# Allegro board K3_COM260_KIT_V02-20260310_1330_pcb.brd
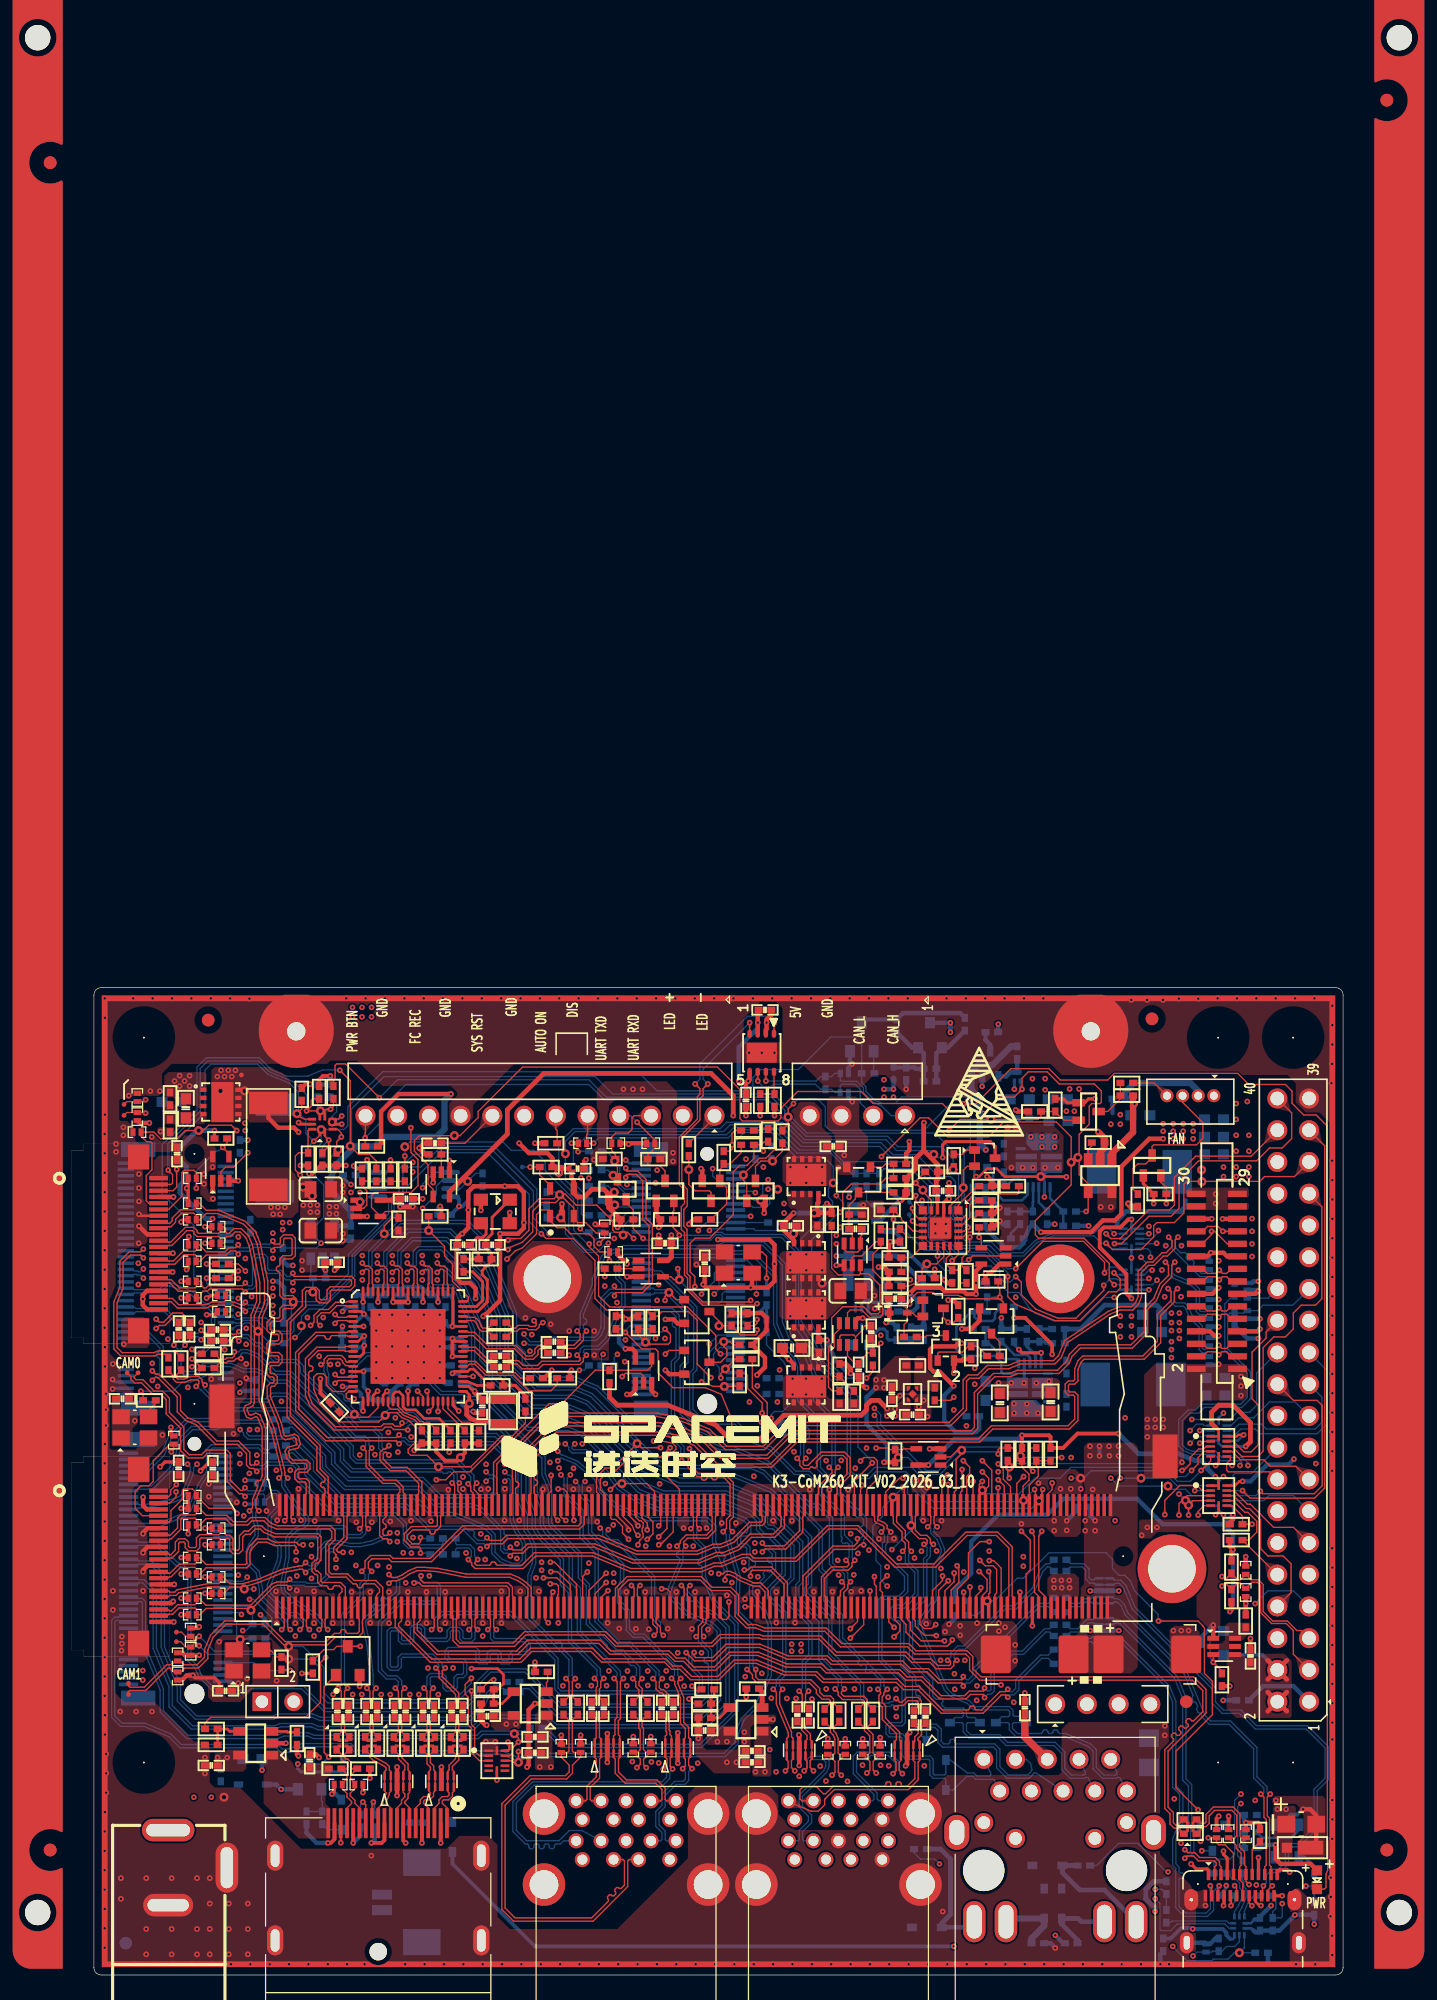
[diagram p0: board, top side]
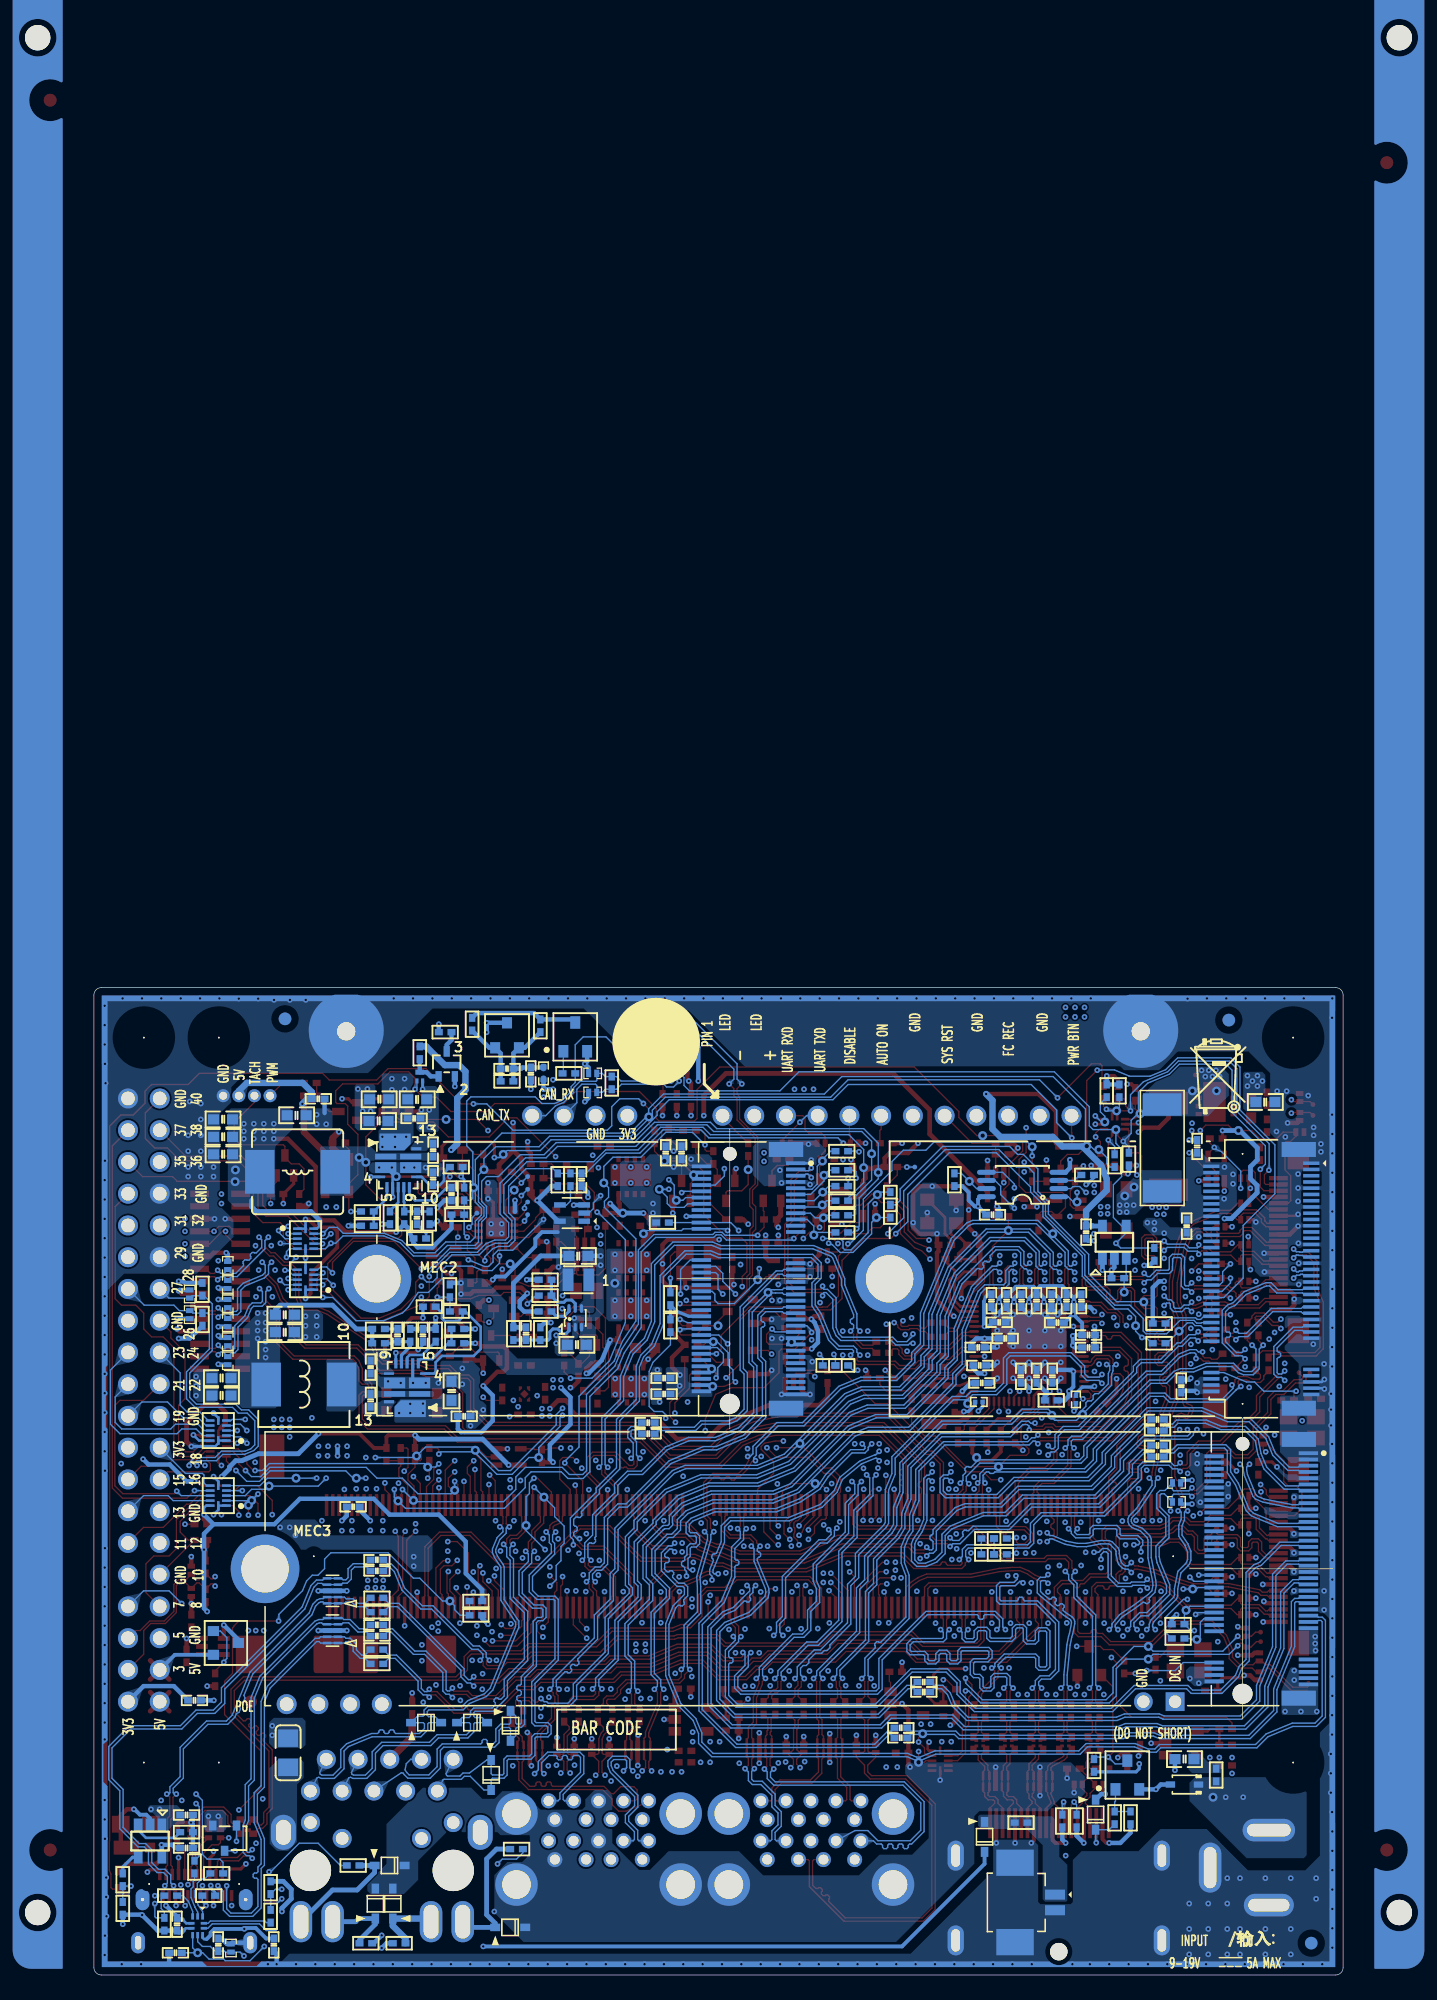
[diagram p1: board, bottom side, seen from below]

Outline 100 x 79 mm; copper layers: TOP, GND02, ART03, ART04, GND05, BOTTOM. Coordinates in mm from the lower left corner of the outline.
Outline path: 0,78.4 0,0.6 arc(0.18,0.18) 0.6,0 99.4,0 arc(99.82,0.18) 100,0.6 100,78.4 arc(99.82,78.82) 99.4,79 0.6,79 arc(0.18,78.82) 0,78.4

## Design rules (mm)
constraint set DEFAULT: min track width 0.1, pair gap 0.125
net group CSI0_D0: nets MIPI_CSI0_DN2 MIPI_CSI0_DP2
net group CSI0_D1: nets MIPI_CSI0_DN3 MIPI_CSI0_DP3
net group CSI1_CLK: nets MIPI_CSI0_CLKN MIPI_CSI0_CLKP
net group CSI1_D0: nets MIPI_CSI0_DN0 MIPI_CSI0_DP0
net group CSI1_D1: nets MIPI_CSI0_DN1 MIPI_CSI0_DP1
net group DP1_AUXP: nets DP1_AUXN DP1_AUXP
net group DP1_TX0N: nets DP1_TX0N DP_CON_LANE0_N
net group DP1_TX0P: nets DP1_TX0P DP_CON_LANE0_P
net group DP1_TX1N: nets DP1_TX1N DP_CON_LANE1_N
net group DP1_TX1P: nets DP1_TX1P DP_CON_LANE1_P
net group DP1_TX2N: nets DP1_TX2N DP_CON_LANE2_N
net group DP1_TX2P: nets DP1_TX2P DP_CON_LANE2_P
net group DP1_TX3N: nets DP1_TX3N DP_CON_LANE3_N
net group DP1_TX3P: nets DP1_TX3P DP_CON_LANE3_P
net group DP_GBE_MDI0: nets PHY1_MDI0+ PHY1_MDI0-
net group DP_GBE_MDI1: nets PHY1_MDI1+ PHY1_MDI1-
net group DP_GBE_MDI2: nets PHY1_MDI2+ PHY1_MDI2-
net group DP_GBE_MDI3: nets PHY1_MDI3+ PHY1_MDI3-
net group DSP1_DN: nets DSP1_DN U3_D1N
net group DSP1_DP: nets DSP1_DP U3_D1P
net group DSP1_SSRX: nets U3_RX1N U3_RX1P
net group DSP1_SSTX_N: nets DSP1_SSTX_N U3_TX1N
net group DSP1_SSTX_P: nets DSP1_SSTX_P U3_TX1P
net group DSP2_DN: nets DSP2_DN U3_D2N
net group DSP2_DP: nets DSP2_DP U3_D2P
net group DSP2_SSRX: nets U3_RX2N U3_RX2P
net group DSP2_SSTX_N: nets DSP2_SSTX_N U3_TX2N
net group DSP2_SSTX_P: nets DSP2_SSTX_P U3_TX2P
net group DSP3_DN: nets DSP3_DN U3_D3N
net group DSP3_DP: nets DSP3_DP U3_D3P
net group DSP3_SSRX: nets U3_RX3N U3_RX3P
net group DSP3_SSTX_N: nets DSP3_SSTX_N U3_TX3N
net group DSP3_SSTX_P: nets DSP3_SSTX_P U3_TX3P
net group DSP4_DN: nets DSP4_DN U3_D4N
net group DSP4_DP: nets DSP4_DP U3_D4P
net group DSP4_SSRX: nets U3_RX4N U3_RX4P
net group DSP4_SSTX_N: nets DSP4_SSTX_N U3_TX4N
net group DSP4_SSTX_P: nets DSP4_SSTX_P U3_TX4P
net group MIPI_CSI1_CLK: nets MIPI_CSI1_CLKN MIPI_CSI1_CLKP
net group MIPI_CSI2_CLKP: nets MIPI_CSI2_CLKN MIPI_CSI2_CLKP
net group MIPI_CSI2_DP0: nets MIPI_CSI2_DN0 MIPI_CSI2_DP0
net group MIPI_CSI2_DP1: nets MIPI_CSI2_DN1 MIPI_CSI2_DP1
net group MIPI_CSI2_DP2: nets MIPI_CSI2_DN2 MIPI_CSI2_DP2
net group MIPI_CSI2_DP3: nets MIPI_CSI2_DN3 MIPI_CSI2_DP3
net group MIPI_CSI3_CLK: nets MIPI_CSI3_CLKN MIPI_CSI3_CLKP
net group PCIE0_REFCLK_P: nets PCIE0_REFCLK_N PCIE0_REFCLK_P
net group PCIE0_RX0: nets PCIE0_RX0N PCIE0_RX0P
net group PCIE0_RX1: nets PCIE0_RX1N PCIE0_RX1P
net group PCIE0_RX2: nets PCIE1_RX0N PCIE1_RX0P
net group PCIE0_RX3: nets PCIE1_RX1N PCIE1_RX1P
net group PCIE0_TX0N: nets PCIE0_TX0N PCIEA_0_TX0_M2_N
net group PCIE0_TX0P: nets PCIE0_TX0P PCIEA_0_TX0_M2_P
net group PCIE0_TX1N: nets PCIE0_TX1N PCIEA_1_TX1_M2_N
net group PCIE0_TX1P: nets PCIE0_TX1P PCIEA_1_TX1_M2_P
net group PCIE1_CLK: nets PCIE5_REFCLK_N PCIE5_REFCLK_P
net group PCIE1_RX0: nets PCIE5_RX0N PCIE5_RX0P
net group PCIE1_TX0: nets PCIE5_TX0N PCIE5_TX0P
net group PCIE1_TX0N: nets PCIE1_TX0N PCIEB_0_TX0_M2_N
net group PCIE1_TX0P: nets PCIE1_TX0P PCIEB_0_TX0_M2_P
net group PCIE1_TX1N: nets PCIE1_TX1N PCIEB_1_TX1_M2_N
net group PCIE1_TX1P: nets PCIE1_TX1P PCIEB_1_TX1P_M2_P
net group PCIE2/USB3-B_TX0: nets PCIE2/USB3-B_TX0N PCIE2/USB3-B_TX0P
net group PCIE3/USB3-C_RX0N: nets PCIE3/USB3-C_RX0N PCIE_RX1_MB_N
net group PCIE3/USB3-C_RX0P: nets PCIE3/USB3-C_RX0P PCIE_RX1_MB_P
net group PCIE3/USB3-C_TX0N: nets PCIE3/USB3-C_TX0N PCIE_TX1_MB_N
net group PCIE3/USB3-C_TX0P: nets PCIE3/USB3-C_TX0P PCIE_TX1_MB_P
net group PCIE4/USB3-D_RX0N: nets PCIE4/USB3-D_RX0N PCIE_RX0_MB_N
net group PCIE4/USB3-D_RX0P: nets PCIE4/USB3-D_RX0P PCIE_RX0_MB_P
net group PCIE4/USB3-D_TX0N: nets PCIE4/USB3-D_TX0N PCIE_TX0_MB_N
net group PCIE4/USB3-D_TX0P: nets PCIE4/USB3-D_TX0P PCIE_TX0_MB_P
net group PCIEE_M2_TX0_: nets PCIEE_M2_TX0_N PCIEE_M2_TX0_P
net group USB0_CON_N: nets USB0_CON_N USB20_A_DRD_USB_M
net group USB0_CON_P: nets USB0_CON_P USB20_A_DRD_USB_P
net group USB1_AP: nets USB20_B_USB_M USB20_B_USB_P
net group USB1_AP_HUB_: nets USB1_AP_HUB_N USB1_AP_HUB_P
net group USB2_AP: nets USB20_HOST_M USB20_HOST_P
net group USB3_SIGNALS: nets USBSS0_TX_HUB_N USBSS0_TX_HUB_P
net group USBC_RX1_N: nets USB_DRD_RX1N USBC_RX1_N
net group USBC_RX1_P: nets USB_DRD_RX1P USBC_RX1_P
net group USBC_RX2_N: nets USB_DRD_RX2N USBC_RX2_N
net group USBC_RX2_P: nets USB_DRD_RX2P USBC_RX2_P
net group USBC_TX1_N: nets USB_DRD_TX1N USBC_TX1_N
net group USBC_TX1_P: nets USB_DRD_TX1P USBC_TX1_P
net group USBC_TX2_N: nets USB_DRD_TX2N USBC_TX2_N
net group USBC_TX2_P: nets USB_DRD_TX2P USBC_TX2_P
net group USBSS0_RX_HUB_: nets USBSS0_RX_HUB_N USBSS0_RX_HUB_P
net group USBSS_TX: nets PCIE2/USB3-B_RX0N PCIE2/USB3-B_RX0P
net group DP_CON_AUX_N: nets DP_CON_AUX_N DP_CON_AUX_P DP_CON_AUX_R_N DP_CON_AUX_R_P
net group DP_HDMI_SIGNALS: nets DP_CON_LANE0_R_N DP_CON_LANE0_R_P DP_CON_LANE1_R_N DP_CON_LANE1_R_P DP_CON_LANE2_R_N DP_CON_LANE2_R_P DP_CON_LANE3_R_N DP_CON_LANE3_R_P
net group PCIE3_REFCLK_N: nets N16915381 PCIE3_REFCLK_N PCIE4_REFCLK_N
net group PCIE3_REFCLK_P: nets N16915365 PCIE3_REFCLK_P PCIE4_REFCLK_P
nets with their own width: min track width 0.1; nets VDD_5V_SYS
nets with their own width: min track width 0.589; nets VDD_CVB VDD_DCIN
nets with their own width: min track width 1.826; nets VDD_3V3_SYS

## Placement (name value [footprint] x y rotation side)
C1001  100uF-50V  [CAP_SMD_7343]  75.31 25.65 180 top
C1002  100uF-50V  [CAP_SMD_7343]  84.33 25.65 0 top
C1003  1uF  [C0402]  79.25 37.47 180 bottom
C1101  100nF  [C0603]  6.22 69.85 180 bottom
C1102  22uF-25V  [C0805]  18.16 62.87 0 top
C1103  1uF  [C0603]  7.37 69.34 270 top
C1104  4.7uF  [C0603]  12.7 17.27 0 bottom
C1105  22uF-25V  [C0805]  18.16 59.56 0 top
C1201  4.7uF  [C0603]  55.88 50.16 180 top
C1202  22uF  [C0805]  60.58 54.74 0 top
C1203  0.47uF  [C0402]  61.21 48.39 270 top
C1204  0.47uF  [C0402]  62.23 51.44 90 top
C1205  1uF  [C0402]  55.75 59.94 180 top
C1206  0.47uF  [C0402]  60.96 59.69 0 top
C1301  10uF  [C0603]  72.52 45.77 90 top
C1302  10uF  [C0603]  71.37 46.74 90 bottom
C1303  10uF  [C0603]  76.58 45.85 90 top
C1304  100nF  [C0402]  70.36 44.7 180 bottom
C1305  0.1uF  [C0402]  77.85 45.97 90 bottom
C1306  2.2nF  [C0402]  75.69 51.18 90 bottom
C1307  22uF  [C0603]  84.71 51.44 180 bottom
C1308  22uF  [C0603]  89.79 46.35 0 bottom
C1309  22uF  [C0603]  89.79 47.75 0 bottom
C1310  22uF  [C0603]  84.71 52.83 180 bottom
C1311  2.2uF  [C0402]  77.85 48.64 270 bottom
C1312  1uF  [C0402]  73.66 51.18 90 bottom
C1313  10uF  [C0603]  77.22 68.33 0 bottom
C1314  10uF  [C0603]  74.12 70.06 180 bottom
C1315  10uF  [C0603]  77.16 70.06 0 bottom
C1316  100nF  [C0402]  74.37 68.54 180 bottom
C1317  0.1uF  [C0402]  72.85 66 270 bottom
C1318  2.2nF  [C0402]  74.14 60.58 270 bottom
C1319  22uF  [C0603]  89.66 68.45 0 bottom
C1320  22uF  [C0603]  89.66 65.66 0 bottom
C1321  22uF  [C0603]  89.66 67.06 0 bottom
C1322  22uF  [C0603]  83.77 68.78 180 bottom
C1323  2.2uF  [C0402]  72.85 63.71 90 bottom
C1324  1uF  [C0402]  71.37 62.48 270 bottom
C1325  10uF  [C0603]  61.34 50.42 0 bottom
C1326  22pF  [C0402]  65.41 51.31 270 bottom
C1327  10uF  [C0603]  61.21 57.53 180 bottom
C1328  1uF  [C0402]  65.53 44.83 0 top
C1329  2.2uF  [C0402]  63.88 46.54 270 top
C1401  0.1uF  [C0402]  60.96 63.63 270 bottom
C1402  0.1uF  [C0402]  67.94 62.74 0 top
C1403  10nF  [C0402]  64.14 54.1 180 top
C1501  0.1uF  [C0402]  93.34 4.06 270 bottom
C1502  1uF  [C0402]  92.58 10.16 180 bottom
C1503  4.7uF  [C0402]  85.6 2.41 270 bottom
C1504  390pF  [C0402]  93.47 1.78 0 bottom
C1505  390pF  [C0402]  90.04 2.41 90 bottom
C1506  0.1uF  [C0402]  77.34 27.13 0 bottom
C1507  0.1uF  [C0402]  77.34 28.02 0 bottom
C1508  0.1uF  [C0402]  92.58 12.8 180 bottom
C1509  100uF-50V  [CAP_SMD_3216]  96.65 12.06 0 top
C1510  0.1uF  [C0402]  77.34 32.33 0 bottom
C1511  0.1uF  [C0402]  77.34 33.22 0 bottom
C1601  0.1uF  [C0402]  40.82 21.34 270 top
C1602  0.1uF  [C0402]  39.85 21.34 270 top
C1603  0.1uF  [C0402]  36.86 49.78 180 top
C1604  1uF  [C0402]  35.31 19.05 180 top
C1605  1uF  [C0402]  24.54 47.9 270 bottom
C1606  0.1uF  [C0402]  32.51 49.53 180 top
C1607  0.1uF  [C0402]  32.51 48.64 180 top
C1608  0.1uF  [C0402]  36.86 50.67 180 top
C1609  0.1uF  [C0402]  45.45 21.34 270 top
C1610  0.1uF  [C0402]  46.39 21.34 270 top
C1611  1uF  [C0402]  35.31 17.78 180 top
C1612  10uF  [C0402]  25.8 47.9 270 bottom
C1613  0.1uF  [C0402]  65.63 20.65 270 top
C1614  0.1uF  [C0402]  66.57 20.65 270 top
C1615  1uF  [C0402]  52.68 17.02 180 top
C1616  0.1uF  [C0402]  56.31 20.8 270 top
C1617  0.1uF  [C0402]  57.25 20.8 270 top
C1618  10pF  [C0402]  31.88 58.42 180 top
C1619  1uF  [C0402]  52.68 17.93 180 top
C1620  10pF  [C0402]  29.59 58.42 0 top
C1621  10uF  [C0402]  31.09 45.49 90 top
C1622  1uF  [C0402]  48.9 19.56 0 top
C1623  1uF  [C0402]  20.57 59.44 90 bottom
C1624  1uF  [C0402]  31.5 20.7 0 top
C1625  1uF  [C0402]  27.53 52.22 0 bottom
C1626  1uF  [C0402]  28.07 60.83 0 bottom
C1627  1uF  [C0402]  23.34 53.95 90 bottom
C1628  0.1uF  [C0402]  23.27 47.9 90 bottom
C1629  0.1uF  [C0402]  25.74 53.95 90 bottom
C1630  0.1uF  [C0402]  29.08 48.77 0 bottom
C1631  0.1uF  [C0402]  28.15 53.95 90 bottom
C1632  0.1uF  [C0402]  20.94 53.95 90 bottom
C1633  1uF  [C0402]  24.54 53.95 90 bottom
C1634  1uF  [C0402]  29.21 50.22 0 bottom
C1635  1uF  [C0402]  27.05 50.93 0 bottom
C1636  0.1uF  [C0402]  28.92 47.37 0 bottom
C1637  0.1uF  [C0402]  20.38 51.21 0 bottom
C1638  0.1uF  [C0402]  22.86 52.2 180 bottom
C1639  0.1uF  [C0402]  20.38 50.21 0 bottom
C1640  0.1uF  [C0402]  22.14 53.95 90 bottom
C1641  0.1uF  [C0402]  26.94 53.95 90 bottom
C1642  1uF  [C0402]  19 57.02 0 top
C1643  100nF  [C0201]  29.16 45.85 0 bottom
C1644  1uF  [C0201]  21.39 46.05 90 bottom
C1701  0.1uF  [C0402]  65.02 72.1 90 bottom
C1702  0.1uF  [C0402]  66.93 72.52 180 bottom
C1801  0.1uF  [C0402]  22.67 21.08 270 top
C1802  0.1uF  [C0402]  21.78 21.08 270 top
C1803  0.1uF  [C0402]  24.07 21.08 270 top
C1804  0.1uF  [C0402]  24.96 21.08 270 top
C1805  0.1uF  [C0402]  27.24 21.08 270 top
C1806  0.1uF  [C0402]  26.35 21.08 270 top
C1807  0.1uF  [C0402]  17.27 17.14 90 top
C1808  0.1uF  [C0402]  29.53 21.08 270 top
C1809  0.1uF  [C0402]  28.64 21.08 270 top
C1810  0.1uF  [C0402]  20.38 21.08 270 top
C1811  0.1uF  [C0402]  19.49 21.08 270 top
C1812  1uF  [C0402]  9.4 16.76 180 top
C1901  0.1uF  [C0402]  6.65 65.71 90 top
C1902  0.1uF  [C0402]  12.95 47.12 90 bottom
C2001  0.1uF  [C0402]  74.52 21.39 270 top
C2002  1nF  [C1206]  84.45 17.78 270 bottom
C2101  10uF  [C0402]  54.36 47.75 0 bottom
C2102  0.1uF  [C0402]  54.36 46.48 180 bottom
C2103  0.1uF  [C0402]  45.72 58.55 180 top
C2104  0.1uF  [C0402]  55.63 43.31 0 bottom
C2105  0.1uF  [C0402]  55.63 44.2 0 bottom
C2106  10uF  [C0402]  54.23 65.79 90 bottom
C2107  0.1uF  [C0402]  52.96 65.79 270 bottom
C2201  10uF  [C0402]  9.53 40.51 90 top
C2202  0.1uF  [C0402]  11.68 66.29 270 bottom
C2203  0.22uF  [C0402]  35.4 19.78 0 bottom
C2204  0.22uF  [C0402]  35.4 18.98 0 bottom
C2205  0.22uF  [C0402]  33.56 22.65 0 bottom
C2206  0.22uF  [C0402]  33.56 23.45 0 bottom
C2207  0.22uF  [C0402]  14.86 41.48 0 bottom
C2208  0.22uF  [C0402]  14.86 42.37 0 bottom
C2209  0.22uF  [C0402]  14.86 44.45 0 bottom
C2210  0.22uF  [C0402]  14.86 43.56 0 bottom
C2211  0.1uF  [C0402]  10.54 22.73 180 top
C2301  10uF  [C0402]  12.52 59.92 270 bottom
C2302  0.1uF  [C0402]  6.78 40.54 270 top
C2303  0.22uF  [C0402]  9.88 50.75 0 top
C2304  0.22uF  [C0402]  9.88 51.64 0 top
C2305  0.22uF  [C0402]  7.67 51.69 270 top
C2306  0.22uF  [C0402]  6.78 51.69 270 top
C2307  0.1uF  [C0402]  2.29 46.1 0 top
C2308  0.1uF  [C0402]  25.02 62.1 180 top
C2401  0.1uF  [C0402]  92.58 25.53 270 top
C2402  0.1uF  [C0402]  91.95 21.97 0 bottom
C2501  0.1uF  [C0402]  82.04 70.1 0 bottom
C2502  1uF  [C0402]  38.73 64.52 0 top
C2503  10nF  [C0402]  27.3 66.55 180 top
C2504  0.1uF  [C0402]  53.72 77.22 180 top
C2505  0.1uF  [C0402]  52.2 69.98 270 top
C2506  0.1uF  [C0402]  48.9 56.95 270 top
C2507  0.1uF  [C0402]  59.18 66.29 0 top
D1001  NCD0603G1  [SLED1X2-2_7X1_1-H1_0]  97.92 7.62 270 top
D1002  BAT54HT1G  [SOD2-P2_32-1_8X1_35-H1_0]  28.7 11.05 270 bottom
D1101  DDZ22BSF-7  [DIODE_SMD_SOD323_C]  12.7 15.24 0 bottom
D1401  BAT54CW  [SOT323]  71.32 65.35 90 top
D1402  BAT54CW  [SOT323]  67.18 53.34 90 top
D1403  BZT52C3V3T  [DIODE_SMD_SOD523_B]  64.39 52.96 0 top
D1501  MSMP20A-M3/89A  [DO219AD-2_3X1_4-H0_73]  96.75 10.19 180 top
D1502  BTRD04A02  [SDOM2-1_4X0_85]  90.83 11.3 270 top
D1503  BTRD04A02  [SDOM2-1_4X0_85]  92.23 11.3 270 top
D1504  BTRD04A02  [SDOM2-1_4X0_85]  89.03 2.16 270 bottom
D1505  BTRD04A02  [SDOM2-1_4X0_85]  89.87 11.3 270 top
D1601  BTRD04A02  [SDOM2-1_4X0_85]  43.18 18.16 90 top
D1602  BTRD04A02  [SDOM2-1_4X0_85]  44.58 18.16 90 top
D1603  BTRD04A02  [SDOM2-1_4X0_85]  38.96 18.14 90 top
D1604  BTRD04A02  [SDOM2-1_4X0_85]  37.41 18.14 90 top
D1605  BTRD04A02  [SDOM2-1_4X0_85]  58.75 17.98 90 top
D1606  BTRD04A02  [SDOM2-1_4X0_85]  60.15 17.98 90 top
D1607  BTRD04A02  [SDOM2-1_4X0_85]  61.54 17.98 90 top
D1608  BTRD04A02  [SDOM2-1_4X0_85]  62.94 17.98 90 top
D1701  ESD  [ESD0402]  89.28 49.15 270 bottom
D1702  ESD  [ESD0402]  89.28 50.67 90 bottom
D1703  ESD  [ESD0402]  89.28 52.2 270 bottom
D1704  ESD  [ESD0402]  89.28 53.72 90 bottom
D1705  ESD  [ESD0402]  89.28 55.24 270 bottom
D1706  ESD  [ESD0402]  89.28 56.77 90 bottom
D1801  WS03DLC-B  [SDOM2-3_3X0_7-H1_1]  19.81 12.83 270 bottom
D1802  ESD  [ESD0402]  19.56 15.24 180 top
D1803  ESD  [ESD0402]  21.21 15.24 0 top
D1901  ESD  [ESD0402]  3.45 67.44 180 top
D1902  ESD  [ESD0402]  7.87 63.75 180 top
D1903  ESD  [ESD0402]  7.87 61.75 180 top
D1904  ESD  [ESD0402]  7.87 60.43 180 top
D1905  ESD  [ESD0402]  9.78 59.87 180 top
D1906  ESD  [ESD0402]  9.78 58.55 180 top
D1907  ESD  [ESD0402]  7.87 58.42 180 top
D1908  ESD  [ESD0402]  7.87 57.1 180 top
D1909  ESD  [ESD0402]  7.87 55.5 180 top
D1910  ESD  [ESD0402]  7.87 54.18 180 top
D1911  ESD  [ESD0402]  10.21 54.38 180 top
D1912  ESD  [ESD0402]  10.21 53.06 180 top
D1913  ESD  [ESD0402]  13.34 39.37 180 bottom
D1914  ESD  [ESD0402]  13.34 37.85 180 bottom
D1915  ESD  [ESD0402]  3.48 70.21 90 top
D1916  ESD  [ESD0402]  3.48 68.68 270 top
D1917  ESD  [ESD0402]  6.4 42.8 90 top
D1918  ESD  [ESD0402]  7.87 38.35 180 top
D1919  ESD  [ESD0402]  7.87 37.34 180 top
D1920  ESD  [ESD0402]  7.87 36.02 180 top
D1921  ESD  [ESD0402]  9.78 35.75 180 top
D1922  ESD  [ESD0402]  9.78 34.43 180 top
D1923  ESD  [ESD0402]  7.87 33.4 180 top
D1924  ESD  [ESD0402]  7.87 32.08 180 top
D1925  ESD  [ESD0402]  9.78 31.85 180 top
D1926  ESD  [ESD0402]  9.78 30.53 180 top
D1927  ESD  [ESD0402]  7.87 30.15 180 top
D1928  ESD  [ESD0402]  7.87 28.83 180 top
D1929  ESD  [ESD0402]  6.71 23.93 270 top
D1930  ESD  [ESD0402]  6.71 25.45 90 top
D1931  ESD  [ESD0402]  7.75 27.43 90 top
D1932  ESD  [ESD0402]  7.75 25.91 270 top
D2001  WS03DLC-B  [SDOM2-3_3X0_7-H1_1]  68.2 16 270 bottom
D2002  WS03DLC-B  [SDOM2-3_3X0_7-H1_1]  76.07 5.71 90 bottom
D2003  WS03DLC-B  [SDOM2-3_3X0_7-H1_1]  66.65 19.94 270 bottom
D2004  WS03DLC-B  [SDOM2-3_3X0_7-H1_1]  66.67 3.81 180 bottom
D2005  WS03DLC-B  [SDOM2-3_3X0_7-H1_1]  69.72 20.19 180 bottom
D2006  WS03DLC-B  [SDOM2-3_3X0_7-H1_1]  76.33 8.76 180 bottom
D2007  WS03DLC-B  [SDOM2-3_3X0_7-H1_1]  73.41 20.19 180 bottom
D2008  WS03DLC-B  [SDOM2-3_3X0_7-H1_1]  77.47 5.71 90 bottom
D2101  BTRD04A02  [SDOM2-1_4X0_85]  40.89 59.69 270 top
D2102  BTRD04A02  [SDOM2-1_4X0_85]  41.61 57.85 180 top
D2401  BTRD04A02  [SDOM2-1_4X0_85]  92.2 32.38 270 top
D2402  BTRD04A02  [SDOM2-1_4X0_85]  92.2 30.61 90 top
D2403  BTRD04A02  [SDOM2-1_4X0_85]  92.33 54.48 270 bottom
D2404  BTRD04A02  [SDOM2-1_4X0_85]  92.33 52.83 90 bottom
D2501  BTRD04A02  [SDOM2-1_4X0_85]  60.07 72.14 180 bottom
D2502  BTRD04A02  [SDOM2-1_4X0_85]  60.07 70.61 180 bottom
D2503  BTRD04A02  [SDOM2-1_4X0_85]  39.12 66.55 0 top
D2504  BTRD04A02  [SDOM2-1_4X0_85]  44.58 66.55 0 top
D2505  BTRD04A02  [SDOM2-1_4X0_85]  41.78 66.55 180 top
FB1701  120R-2A  [0402BL]  64.01 72.14 90 bottom
J2  CON_SODIMM_260  [CON_SODIMM_260_SMT_RA_F_P005]  48 33.6 180 top
J3  HDR1x2P MALE 1.25MM  [CON_MISC_002_SMD_RA_M_P013_WTB_B]  26.16 5.81 90 bottom
J5  Type-C-24PIN  [CON_USB_024_SMT_RA_F_100X096_C]  91.97 2.92 0 top
J6  USB-303WSD-BRY  [USB3_DUAL-12_50X17_50-H16_19]  42.6 7.24 0 top
J7  USB-303WSD-BRY  [USB3_DUAL-12_50X17_50-H16_19]  59.6 7.24 0 top
J8  Molex-displayport-472720024_1  [DP20-P0_5-S17_8X14_4-H7]  22.76 5.01 0 top
J10  MDT275E02001  [M2_KEYE-75P-22_15X9_35-H2_75]  49.1 55.7 270 bottom
J11  MDT275M02001  [M2_KEYM-77-P0_5-22X9_1-H2_75]  8.05 32.5 270 bottom
J12  HDR2X20P  [CON_HDR_002X020_TH_ST_M_P025_B]  96 46 90 top
J13  HDR1x4P MALE 1.25MM  [CON_MISC_004_TH_ST_M_P013_WTB]  89.65 70.35 0 top
J14  HDR1x12P MALE 2.54MM  [CON_HDR_001X012_TH_RA_M_P025]  35.71 71.5 180 top
J15  LPJG0926HENL  [RJ45_POE-15_93X21_25-H13_30]  76.95 8.37 0 top
J16  DC-005-A250  [JACK_DC-005-5A-2P5_XKB]  8.3 8.59 90 top
J17  PZ254V-11-04P  [CON_HDR_001X004_TH_RA_M_P025_B]  61.11 71.5 180 top
J18  PZ254V-11-02P  [HEADER2-1_0-P2_54]  14.72 21.87 0 top
J19  PZ254V-11-04P  [CON_HDR_001X004_TH_ST_M_P025]  76.95 21.67 0 top
J20  XW05202-220R-00  [22P_0-5PITCH-SMD]  5.18 58.5 90 top
J21  XW05202-220R-00  [22P_0-5PITCH-SMD]  5.18 33.5 90 top
J24  MDT275M02001  [CON_MINIPEX_075_SMT_RA_M2_KEYM_B]  6.67 55.7 270 bottom
J1701  FPC_30P  [FPC30-1_0-22_1X2_5-H5_4]  89.9 55.5 90 top
L1301  FXL0630_1R5_M  [L2-7_3X6_8-H3_0]  83.19 47.24 0 bottom
L1302  MWSA0624S_1R0MT  [L2-7_3X6_8-H2_4]  83.69 64.26 0 bottom
L1303  1uH  [IND_2016A]  61.21 55.63 0 bottom
L1501  NC/12ohm  [FILTER_004_SMD_006X005]  87.76 11.86 90 top
L1601  4.7uH-2A  [IND2520]  32.77 45.09 270 top
L1801  NC/12ohm  [FILTER_004_SMD_006X005]  22.23 18.54 0 top
L1802  NC/12ohm  [FILTER_004_SMD_006X005]  24.51 18.54 0 top
L1803  NC/12ohm  [FILTER_004_SMD_006X005]  26.8 18.54 0 top
L1804  NC/12ohm  [FILTER_004_SMD_006X005]  29.08 18.54 0 top
L1805  NC/12ohm  [FILTER_004_SMD_006X005]  19.94 18.54 0 top
MEC1  HOLE3  [HOLE3_8X5_5-PTH-TP]  36.3 55.7 180 bottom
MEC5  K3-CoM260_KIT_HOLE  [MECH_RECT_01000X00790_HOLES_C]  4 17 0 top
NOREF  -  []  195.17 236.6 0 top
NOREF#2  -  []  101 34.5 270 top
NOREF#3  -  []  307.34 -106.68 0 top
NOREF#4  -  []  -5.18 231.62 0 top
NOREF#5  -  []  -1 43.5 270 top
NOREF#6  -  [unnamed#2]  87.45 21.86 0 top
NOREF#7  -  []  71.35 147.42 0 top
NOREF#8  -  []  101 146 90 top
NOREF#9  -  [unnamed#3]  102 0 90 top
NOREF#10  -  []  101 116.5 90 top
NOREF#11  -  []  271.27 185.47 0 top
NOREF#12  -  []  101 66.54 270 top
NOREF#13  -  []  81.8 80 180 top
NOREF#14  -  [unnamed#4]  102 160 90 top
NOREF#15  -  []  -1 155.5 90 top
NOREF#16  -  []  307.34 -170.18 0 top
NOREF#17  -  []  -7 158 0 top
NOREF#18  -  []  106.68 -133.35 0 top
NOREF#19  -  []  -17.78 -44.45 0 top
NOREF#20  -  []  -1 70.22 270 top
NOREF#21  -  [unnamed#5]  -2 0 90 top
NOREF#22  -  []  -1 93.46 90 top
NOREF#23  -  []  -6.35 -123.19 0 top
NOREF#24  -  []  70.18 70.18 0 top
NOREF#25  -  [unnamed#6]  -2 160 90 top
NOREF#26  -  []  509.27 49.53 0 top
NOREF#27  -  []  0 78.24 0 top
NOREF#28  -  []  -1 14 270 top
NOREF#29  -  []  18.2 80 0 top
NOREF#30  -  [unnamed#2]  84.7 76.5 0 top
NOREF#31  -  []  101 89.77 90 top
NOREF#32  -  []  101 4.5 270 top
NOREF#33  -  []  0.82 0 90 top
NOREF#34  -  [unnamed#2]  9.15 76.4 0 top
NOREF#35  -  []  -1 125.5 90 top
NOREF#36  -  []  140.49 208.61 0 top
NOREF#37  -  []  0.6 0 90 top
NOREF#38  -  [unnamed#2]  84.7 76.5 180 bottom
NOREF#39  -  [unnamed#2]  9.15 76.4 180 bottom
NOREF#40  -  [unnamed#2]  2.55 2.55 180 bottom
NOREF#41  -  []  7.49 72.01 180 bottom
NOREF#42  -  []  54.99 74.68 180 bottom
NOREF#43  -  []  57.91 19.63 180 bottom
Q1001  NX3008NBKW  [SOT323-P1_3-2_2X1_35-H1_0]  52.96 62.74 0 top
Q1101  AONR21357  [DFN8-P0_65-3X3-H0_9]  10.16 69.85 270 top
Q1201  AONR21357  [DFN8-P0_65-3X3-H0_9]  57 47.21 180 top
Q1202  AONR21357  [DFN8-P0_65-3X3-H0_9]  57.02 53.21 0 top
Q1203  BSS138DW-7-F  [SC70_6]  60.33 51.28 0 top
Q1204  AONR21357  [DFN8-P0_65-3X3-H0_9]  57.02 63.88 0 top
Q1205  AONR21357  [DFN8-P0_65-3X3-H0_9]  57.02 57.15 180 top
Q1206  BSS138DW-7-F  [SC70_6]  60.71 57.66 180 top
Q1207  2N7002  [SOT-23-3_0X1_4-H1_15]  61.21 63.63 180 top
Q1301  DMG1012UW-7  [SOT323-3-0_65-2_2X1_35-H1_1]  71.75 72.9 180 bottom
Q1302  DMN26DOUFB4-7  [DFET_003_SMD_010X006_B]  73.91 71.88 270 bottom
Q1401  BSS84W-7-F  [SOT323-3-0_65-2_2X1_35-H1_1]  68.2 50.16 0 top
Q1402  2N7002  [SOT-23-3_0X1_4-H1_15]  71.86 52.32 180 top
Q1501  2N7002  [SOT-23-3_0X1_4-H1_15]  89.53 10.95 0 bottom
Q1701  WPM3401  [SOT3-3_52X3_4-H1_25]  66.93 75.18 180 bottom
Q1702  S8050  [SOT3-3_5X3_8-H1_1]  61.47 75.06 180 bottom
Q1801  S8050  [SOT3-3_5X3_8-H1_1]  20.32 25.15 0 top
Q1802  S8050  [SOT3-3_5X3_8-H1_1]  17.27 16 180 bottom
Q2101  2N7002  [SOT-23-3_0X1_4-H1_15]  48.26 49.02 270 top
Q2102  2N7002  [SOT-23-3_0X1_4-H1_15]  48.26 53.09 270 top
Q2401  WPM3401  [SOT3-3_52X3_4-H1_25]  89.43 26.57 270 bottom
Q2402  NST45010MW6T1G  [SC70_6]  90.47 26.29 270 top
Q2501  NX3008NBKW  [SOT323-P1_3-2_2X1_35-H1_0]  84.71 64.77 0 top
Q2502  NX3008NBKW  [SOT323-P1_3-2_2X1_35-H1_0]  79.63 69.09 270 top
Q2503  NX3008NBKW  [SOT323-P1_3-2_2X1_35-H1_0]  41.91 62.87 0 top
Q2504  NX3008NBKW  [SOT323-P1_3-2_2X1_35-H1_0]  45.72 62.74 0 top
Q2505  NX3008NBKW  [SOT323-P1_3-2_2X1_35-H1_0]  49.4 62.74 180 top
R1001  10k  [R0402]  64.14 41.53 270 top
R1002  47k  [R0402]  91.31 54.86 270 bottom
R1003  47k  [R0402]  91.31 52.45 90 bottom
R1004  47k  [R0402]  74.3 41.66 270 top
R1005  47k  [R0402]  76.58 41.66 270 top
R1006  47k  [R0402]  91.06 32.64 270 top
R1007  47k  [R0402]  91.06 30.35 90 top
R1008  47k  [R0402]  19.43 65.28 90 top
R1009  47k  [R0402]  18.92 70.74 270 bottom
R1010  1k  [R0402]  25.78 12.19 0 bottom
R1011  1.8k  [R0402]  55.12 67.06 270 top
R1012  10k  [R0402]  22.23 66.29 0 top
R1013  10k  [R0402]  64.52 63.75 0 top
R1014  0R  [R0402]  53.98 67.18 90 top
R1015  0R  [R0402]  52.32 67.56 0 top
R1101  1mR  [R2512]  13.97 66.29 270 top
R1102  1R  [R0402]  10.16 16 90 bottom
R1103  100k  [R0402]  6.1 70.1 270 top
R1104  1mR  [R2512]  14.48 66.17 270 bottom
R1105  100k  [R0402]  6.1 67.94 270 top
R1201  10k  [R0402]  60.83 46.23 90 top
R1202  49.9k  [R0402]  58.04 50.29 90 top
R1203  33k  [R0402]  59.69 48.39 90 top
R1204  0R  [R0402]  62.36 49.28 90 top
R1205  10k  [R0402]  59.69 46.23 90 top
R1206  49.9k  [R0402]  57.91 60.45 90 top
R1207  15k  [R0402]  59.05 60.45 90 top
R1208  10k  [R0402]  64.52 62.61 180 top
R1209  1M  [R0402]  60.96 60.83 0 top
R1210  1M  [R0402]  64.52 64.9 0 top
R1301  10k  [R0402]  70.87 50.55 180 bottom
R1302  10k  [R0402]  71.5 54.74 90 bottom
R1303  10k  [R0402]  73.15 53.47 0 bottom
R1304  100k  [R0402]  77.22 50.55 0 bottom
R1305  1k  [R0402]  77.22 51.69 180 bottom
R1306  0R  [R0402]  70.99 53.09 0 bottom
R1307  13.7k  [R0402]  74.68 51.18 90 bottom
R1308  10k  [R0402]  70.87 51.69 0 bottom
R1309  10k  [R0402]  72.64 51.18 270 bottom
R1310  1.27R  [R0402]  71.88 75.44 180 bottom
R1311  100k  [R0402]  73.91 73.79 90 bottom
R1312  0R  [R0402]  78.11 59.94 180 bottom
R1313  10k  [R0402]  78.11 61.09 0 bottom
R1314  100k  [R0402]  75.16 60.58 270 bottom
R1315  1k  [R0402]  73.91 58.93 180 bottom
R1316  22.1k  [R0402]  73.12 60.58 270 bottom
R1317  10k  [R0402]  76.3 60.58 90 bottom
R1318  10k  [R0402]  70.87 60.83 0 bottom
R1319  10k  [R0402]  70.99 64.64 0 bottom
R1320  0R  [R0402]  70.36 62.48 270 bottom
R1321  100k  [R0402]  63.88 53.09 180 bottom
R1322  20k  [R0402]  66.42 51.31 270 bottom
R1323  4.7k  [R0402]  65.53 48.77 0 top
R1324  100k  [R0402]  63.88 54.36 180 bottom
R1325  4.7k  [R0402]  67.31 46.48 90 top
R1326  200k  [R0402]  63.88 55.63 0 bottom
R1327  4.42k  [R0402]  64.26 51.31 90 bottom
R1401  100k  [R0402]  62.87 63.63 270 bottom
R1402  110R  [R0402]  61.85 63.63 270 bottom
R1403  10k  [R0402]  68.83 65.15 90 top
R1404  10k  [R0402]  71.37 63.12 180 top
R1405  10k  [R0402]  73.53 63.12 0 top
R1406  10k  [R0402]  64.14 55.12 0 top
R1407  10k  [R0402]  68.71 55.88 90 top
R1408  10k  [R0402]  64.14 56.26 0 top
R1409  4.7k  [R0402]  67.06 64.26 180 top
R1410  10k  [R0402]  71.37 61.98 0 top
R1411  10k  [R0402]  71.37 60.96 0 top
R1412  1k  [R0402]  62.99 59.18 90 top
R1413  0R  [R0402]  69.85 55.88 90 top
R1414  10k  [R0402]  64.14 57.4 0 top
R1415  100k  [R0402]  69.19 53.09 270 top
R1416  100k  [R0402]  63.5 61.21 180 top
R1417  1k  [R0402]  64.52 59.18 270 top
R1418  100k  [R0402]  70.23 49.78 270 top
R1419  91k  [R0402]  72.01 49.53 0 top
R1420  100k  [R0402]  71.37 59.82 0 top
R1421  19.6k  [R0402]  65.36 51.05 180 top
R1422  5.11k  [R0402]  66.8 55.75 0 top
R1423  100k  [R0402]  27.3 65.66 180 top
R1424  100k  [R0402]  71.88 55.5 0 top
R1501  47k  [R0402]  85.85 6.99 270 bottom
R1502  100k  [R0402]  69.42 29.92 0 bottom
R1503  10k  [R0402]  97.69 5.33 90 bottom
R1504  10k  [R0402]  94.36 4.06 90 bottom
R1505  0R  [R0402]  91.95 8.64 270 bottom
R1506  0R  [R0402]  97.69 7.62 90 bottom
R1507  0R  [R0402]  90.17 8.13 0 bottom
R1508  3.4k  [R0402]  92.58 11.43 180 bottom
R1509  0R  [R0402]  85.85 4.7 270 bottom
R1510  0R  [R0402]  93.85 6.35 0 bottom
R1511  100k  [R0402]  69.42 28.78 180 bottom
R1512  0R  [R0402]  77.34 24.89 0 bottom
R1513  0R  [R0402]  77.34 26.04 0 bottom
R1514  0R  [R0402]  77.34 29.03 0 bottom
R1515  1M  [R0402]  93.34 11.18 270 top
R1516  0R  [R0402]  77.34 30.18 0 bottom
R1517  1M  [R0402]  90.81 6.35 180 bottom
R1518  0R  [R0402]  87.76 11.3 0 top
R1519  0R  [R0402]  87.76 12.45 0 top
R1601  0R  [R0402]  32.51 52.2 180 top
R1602  0R  [R0402]  43.18 21.34 270 top
R1603  0R  [R0402]  32.51 51.05 180 top
R1604  10k  [R0402]  23.37 45.97 0 bottom
R1605  10k  [R0402]  35.43 47.75 180 top
R1606  0R  [R0402]  38.73 21.34 270 top
R1607  10k  [R0402]  37.59 47.75 180 top
R1608  0R  [R0402]  44.32 21.34 270 top
R1609  0R  [R0402]  37.59 21.34 270 top
R1610  4.7k  [R0402]  19.28 45.42 315 top
R1611  6.04k  [R0402]  27.3 60.71 180 top
R1612  0R  [R0402]  58.5 20.78 270 top
R1613  0R  [R0402]  59.66 20.78 270 top
R1614  0R  [R0402]  62.36 20.78 270 top
R1615  0R  [R0402]  61.19 20.78 270 top
R1616  470k  [R0402]  31.32 57.28 180 top
R1617  10k  [R0402]  26.26 43.05 270 top
R1618  10k  [R0402]  34.54 45.59 90 top
R1619  10k  [R0402]  27.4 43.05 270 top
R1620  22R  [R0402]  29.59 56.77 270 top
R1621  10k  [R0402]  32.26 47.17 0 top
R1622  0R  [R0402]  49.15 22.86 0 top
R1623  0R  [R0402]  28.54 43.05 270 top
R1624  0R  [R0402]  48.9 21.72 0 top
R1625  100k  [R0402]  48.9 20.57 180 top
R1626  3.4k-1%  [R0402]  52.73 22.91 180 top
R1627  10k  [R0402]  29.69 43.05 90 top
R1628  10k  [R0402]  30.83 43.05 90 top
R1629  10k  [R0402]  20.45 64.01 0 bottom
R1630  10k  [R0402]  31.11 63.63 270 bottom
R1631  100k  [R0402]  15.11 57.66 270 bottom
R1632  3.4k-1%  [R0402]  18.03 55.75 0 bottom
R1633  0R  [R0402]  31.5 22.86 0 top
R1634  100k  [R0402]  31.5 21.72 180 top
R1635  3.4k-1%  [R0402]  35.81 24.26 180 top
R1701  100k  [R0402]  66.93 71.5 0 bottom
R1702  100k  [R0402]  64.26 75.95 90 bottom
R1703  100k  [R0402]  69.72 76.07 90 bottom
R1704  100k  [R0402]  61.98 72.14 0 bottom
R1801  0R  [R0402]  21.72 18.54 90 top
R1802  0R  [R0402]  22.73 18.54 270 top
R1803  0R  [R0402]  24 18.54 270 top
R1804  1M  [R0402]  21.34 12.32 90 bottom
R1805  1M  [R0402]  22.48 12.32 90 bottom
R1806  0R  [R0402]  25.02 18.54 270 top
R1807  0R  [R0402]  26.29 18.54 270 top
R1808  0R  [R0402]  27.3 18.54 270 top
R1809  0R  [R0402]  28.57 18.54 270 top
R1810  0R  [R0402]  29.59 18.54 270 top
R1811  0R  [R0402]  19.43 18.54 270 top
R1812  100k  [R0402]  19.3 16.51 180 top
R1813  0R  [R0402]  20.45 18.54 270 top
R1814  100k  [R0402]  21.59 16.51 0 top
R1815  10k  [R0402]  9.4 19.68 0 top
R1816  47k  [R0402]  19.94 16.76 90 bottom
R1817  10k  [R0402]  17.53 24.64 90 top
R1818  100k  [R0402]  9.4 18.41 0 top
R1819  6.8k-1%  [R0402]  16.26 18.92 270 top
R1820  10k  [R0402]  18.29 12.57 270 bottom
R1821  47k  [R0402]  17.02 12.57 270 bottom
R1901  10k  [R0402]  10.16 66.93 0 top
R1902  10k  [R0402]  41.27 47.88 90 top
R1903  4.7k  [R0402]  17.14 65.28 90 bottom
R1904  4.7k  [R0402]  18.29 65.28 90 top
R1905  4.7k  [R0402]  18.03 70.61 270 top
R1906  4.7k  [R0402]  17.91 70.74 270 bottom
R1907  0R  [R0402]  18.29 65.15 270 bottom
R1908  0R  [R0402]  19.18 70.61 90 top
R1909  0R  [R0402]  16.64 70.46 90 top
R1910  10k  [R0402]  17.14 65.28 270 top
R2001  0R  [R0402]  66.17 10.08 0 bottom
R2002  510R  [R0402]  75.56 2.54 180 bottom
R2003  510R  [R0402]  78.23 2.54 0 bottom
R2004  0R  [R0402]  79.25 8.76 180 bottom
R2101  47k  [R0402]  52.32 52.45 270 top
R2102  47k  [R0402]  41.78 52.2 270 top
R2103  47k  [R0402]  43.56 52.2 270 top
R2104  0R  [R0402]  52.2 49.28 180 top
R2105  0R  [R0402]  51.69 47.62 270 top
R2106  0R  [R0402]  44.73 52.2 90 top
R2107  0R  [R0402]  41.4 56.52 0 top
R2108  47k  [R0402]  54.48 60.2 180 bottom
R2109  0R  [R0402]  40.13 59.41 180 bottom
R2110  0R  [R0402]  40.13 61.95 180 bottom
R2111  0R  [R0402]  40.13 60.78 180 bottom
R2112  0R  [R0402]  40.13 63.12 180 bottom
R2113  0R  [R0402]  40.13 65.91 180 bottom
R2114  0R  [R0402]  40.13 64.39 180 bottom
R2115  47k  [R0402]  52.2 50.42 0 top
R2116  47k  [R0402]  51.05 52.45 90 top
R2201  47k  [R0402]  13.21 28.07 180 bottom
R2202  0R  [R0402]  13.21 26.92 180 bottom
R2203  0R  [R0402]  73.15 41.66 270 top
R2204  0R  [R0402]  75.44 41.66 90 top
R2205  33R  [R0402]  15.01 24.94 270 top
R2301  0R  [R0402]  28.45 33.66 0 bottom
R2302  47k  [R0402]  14.73 52.13 180 bottom
R2303  0R  [R0402]  28.45 34.92 0 bottom
R2304  0R  [R0402]  14.73 50.55 180 bottom
R2305  0R  [R0402]  27.43 34.92 180 bottom
R2306  0R  [R0402]  36.25 62.13 270 bottom
R2307  0R  [R0402]  41.15 48.77 180 bottom
R2308  0R  [R0402]  27.43 33.66 180 bottom
R2309  0R  [R0402]  36.25 61.11 90 bottom
R2310  0R  [R0402]  40.13 48.77 0 bottom
R2311  0R  [R0402]  10.29 56.9 180 top
R2312  0R  [R0402]  9.14 48.56 0 top
R2313  0R  [R0402]  10.29 55.75 180 top
R2314  0R  [R0402]  9.14 49.71 0 top
R2315  0R  [R0402]  6.99 48.9 270 top
R2316  0R  [R0402]  5.97 48.9 270 top
R2317  10k  [R0402]  21.46 64.01 270 top
R2318  10k  [R0402]  24.38 60.07 90 top
R2319  33R  [R0402]  4.45 45.97 180 top
R2320  0R  [R0402]  22.61 64.01 90 top
R2321  0R  [R0402]  24.89 64.01 90 top
R2322  0R  [R0402]  23.75 64.01 90 top
R2401  100k  [R0402]  91.44 36.07 0 top
R2402  100k  [R0402]  91.44 34.8 0 top
R2403  100k  [R0402]  92.2 28.32 270 top
R2404  47k  [R0402]  90.3 23.62 90 top
R2501  10k  [R0402]  36.2 64.64 0 top
R2502  4.7k  [R0402]  85.34 62.48 0 top
R2503  4.7k  [R0402]  83.57 61.98 90 top
R2504  4.7k  [R0402]  76.96 69.6 270 top
R2505  4.7k  [R0402]  82.68 70.36 180 top
R2506  130R  [R0402]  82.68 71.37 0 top
R2507  100k  [R0402]  75.31 69.09 180 top
R2508  10k  [R0402]  36.58 66.55 0 top
R2509  10k  [R0402]  42.67 60.45 180 top
R2510  10k  [R0402]  41.24 65.29 180 top
R2511  10k  [R0402]  45.85 60.45 180 top
R2512  10k  [R0402]  44.83 65.28 0 top
R2513  10k  [R0402]  54.48 69.98 270 top
R2514  10k  [R0402]  53.34 69.98 90 top
R2515  120R  [R0402]  58.55 71.37 270 bottom
R2516  499R  [R0402]  47.62 66.04 270 top
R2517  10k  [R0402]  48.9 60.45 180 top
R2518  0R  [R0402]  52.32 66.42 180 top
R2519  0R  [R0402]  50.42 65.41 270 top
R2522  33R  [R0402]  53.85 54.1 270 bottom
R2523  0R  [R0402]  53.85 51.94 90 bottom
R2524  6.8k-1%  [R0402]  80.39 66.6 0 top
TP1101  TP  [TP-0_38C0_38]  11.81 72.01 0 top
TP1401  TP  [TP-0_38C0_38]  69.34 60.96 180 bottom
TP1402  TP  [TP-0_38C0_38]  65.28 60.83 180 bottom
TP1403  TP  [TP-0_38C0_38]  65.28 61.85 180 bottom
TP1404  TP  [TP-0_38C0_38]  65.28 62.87 180 bottom
TP1405  TP  [TP-0_38C0_38]  65.28 63.88 180 bottom
TP1406  TP  [TP-0_38C0_38]  66.29 61.09 180 bottom
TP1901  TP  [TP-0_38C0_38]  2.41 68.78 270 top
TP1902  TP  [TP-0_38C0_38]  2.41 69.65 270 top
TP1903  TP  [TP-0_38C0_38]  2.66 48.18 0 top
TP1904  TP  [TP-0_38C0_38]  3.54 48.18 0 top
TP1905  TP  [TP-0_38C0_38]  6.6 26.67 270 top
TP1906  TP  [TP-0_38C0_38]  6.6 27.43 270 top
TP1907  TP  [TP-0_38C0_38]  2.77 23.34 180 top
TP1908  TP  [TP-0_38C0_38]  2.77 22.45 0 top
TP2501  TP  [TP-0_38C0_38]  34.29 64.64 0 bottom
U1001  74LVC1G07GW  [SC70_5]  66.8 41.45 90 top
U1301  SY8370TMC  [QFN13-4_1X3_1-H0_85]  74.93 46.99 0 bottom
U1302  SY8370TMC  [QFN13-4_1X3_1-H0_85]  75.64 64.98 180 bottom
U1303  ETA3512FSG  [SOT563]  61.47 52.58 180 bottom
U1304  ETA5053V180WF1E  [DFN4-0_65-1_05X1_05HS0_47-H0_4]  65.53 46.48 0 top
U1401  74LVC1G07GW  [SC70_5]  61.72 60.96 90 bottom
U1402  EFM8SB10F2G-P3737  [QFN020Q_P050_0030_T018X018]  67.78 59.76 270 top
U1403  SN74LV1T125  [SC70_5]  72.01 57.53 90 top
U1404  SN74LV1T125  [SC70_5]  27.81 63.26 180 top
U1501  WS4603E  [SOT5-3_02X1_7X1_15-H1_15]  95.5 10.72 0 bottom
U1502  FUSB301TMX  [QFN010R_P040_0012X0016_B]  91.69 3.94 0 bottom
U1503  ESD73034D  [DFN10-2_55X1_05-H0_55]  80.9 27.56 90 bottom
U1504  ESD73034D  [DFN10-2_55X1_05-H0_55]  80.9 30.73 90 bottom
U1601  VL817  [QFN76-P0_4-9_0X9_0-H1_0]  25.15 50.29 270 top
U1602  ESD73034D  [DFN10-2_55X1_05-H0_55]  41.1 18.16 0 top
U1603  ESD73034D  [DFN10-2_55X1_05-H0_55]  46.74 18.16 0 top
U1604  ESD73034D  [DFN10-2_55X1_05-H0_55]  65.1 17.98 180 top
U1605  ESD73034D  [DFN10-2_55X1_05-H0_55]  56.46 17.98 180 top
U1606  WS4603E  [SOT5-3_02X1_7X1_15-H1_15]  52.2 20.45 90 top
U1607  P25Q40H  [TSSOP8-P0_65-3_0X6_4-H1_2]  25.65 63.25 0 bottom
U1608  WS4603E  [SOT5-3_02X1_7X1_15-H1_15]  18.31 58.62 180 bottom
U1609  WS4603E  [SOT5-3_02X1_7X1_15-H1_15]  34.92 21.72 90 top
U1610  CAG94104SQNAR  [QFN12-2_5X2_8-H0_55]  32.26 17.14 0 top
U1801  ESD73034D  [DFN10-2_55X1_05-H0_55]  24.27 15.49 0 top
U1802  ESD73034D  [DFN10-2_55X1_05-H0_55]  27.82 15.49 0 top
U1803  WS4603E  [SOT5-3_02X1_7X1_15-H1_15]  12.95 18.54 90 top
U1901  SN74LV1T125  [SC70_5]  10.16 64.52 0 top
U1902  SN74LV1T125  [SC70_5]  44 48.35 0 top
U1903  TS3USB30E  [QFN010R_P040_0018X0014]  18.29 68.07 0 top
U2101  74LVC1G07GW  [SC70_5]  44.58 56.52 270 top
U2301  74LVC1G07GW  [SC70_5]  21.97 61.34 270 top
U2401  CAG94104SQNAR  [QFN12-2_5X2_8-H0_55]  90.04 43.56 0 bottom
U2402  CAG94104SQNAR  [QFN12-2_5X2_8-H0_55]  90.04 42.29 0 top
U2403  CAG94104SQNAR  [QFN12-2_5X2_8-H0_55]  90.04 38.35 0 bottom
U2404  CAG94104SQNAR  [QFN12-2_5X2_8-H0_55]  90.04 38.35 0 top
U2405  CAG94104SQNAR  [QFN12-2_5X2_8-H0_55]  83.06 58.91 180 bottom
U2406  CAG94104SQNAR  [QFN12-2_5X2_8-H0_55]  83.06 55.63 0 bottom
U2501  GT24C02B-2TFLI-TR  [SOT5-3_5X3_7-H1_25]  37.47 61.82 0 top
U2502  MCP2562FD  [DFN8-0_65-3_0X3_0H2_4X1_6-H1_0]  53.47 73.79 180 top
U2503  WS4603E  [SOT5-3_02X1_7X1_15-H1_15]  80.54 63.96 180 top
Y1601  25MHz,10pF,20PPM  [TSX-3225]  32.13 61.09 270 top
Y2201  32.768KHz 25ppm  [XTAL_SMD_4_032X025_D]  12.32 25.17 0 top
Y2301  32.768KHz 25ppm  [XTAL_SMD_4_032X025_D]  3.28 43.81 0 top
Y2302  32.768KHz 25ppm  [XTAL_SMD_4_032X025_D]  51.59 57 0 top

## Library data of the parts
C1001 C1002 C1509 = 100uF
C1003 C1101 C1103 C1104 C1201 C1203-C1206 C1301-C1329 C1401-C1403 C1501-C1505 C1508 C1603-C1608 C1611 C1612 C1615 C1618-C1642 C1701 C1702 C1807 C1810-C1812 C1901 C1902 C2001 C2101-C2107 C2201 C2202 C2211 C2301 C2302 C2307 C2308 C2401 C2402 C2501-C2507 = CAP_NP
C1102 C1105 = C-C0402-X5R
C1202 C2002 = CAP
C1506 C1507 C1510 C1511 C1601 C1602 C1609 C1610 C1613 C1614 C1616 C1617 C1801-C1806 C1808 C1809 = CAP_NP: signal model: CAP_NP_C0402_DISCRETE_0.1UF_0.1uF
C1643 C1644 = CAP_NP: User Part Number: PARTNUM; Tolerance: TOL
C2203-C2210 C2303-C2306 = CAP_NP: signal model: CAP_NP_C0402_DISCRETE_0.22UF_0.22uF
D1001 = LED
D1002 = DIODE_Schottky
D1101 = DDZ22BSF-7
D1401 D1402 = BAT54CW
D1403 = BZT52C3V3T
D1501 = MSMP20A-M3/89A
D1502-D1505 D1601-D1608 D1801 D2001-D2008 D2101 D2102 D2401-D2404 D2501-D2505 = DIODE_ZENER_BI
D1701-D1706 D1802 D1803 D1901-D1932 = ESD_BI-DIR
FB1701 = FB-FB0402
J2 = CON_SODIMM_260
J3 = HDR1x2P
J5 = Type-C-24PIN
J6 J7 = USB3.0_22P_Dual
J8 = 6601-20FH_0
J10 = M2_KEY_E
J11 J24 = M2_KEY_M
J12 = HDR2X20P
J13 = HDR1x4P
J14 = HDR1x12P
J15 = RJ45_20P-POE
J16 = PJK-3
J17 J19 = HDR_1X4P
J18 = HDR_1X2P
J20 J21 = CAM_FPC_0
J1701 = FPC_1
L1301 = FXL0630_1R5_M
L1302 = MWSA0624S_1R0MT
L1303 = INDUCTOR
L1501 L1801-L1805 = CMF1210DH900MFR_0: signal model: CAP_NP_C0402_DISCRETE_0.1UF_0.1uF
L1601 = L-L2520
MEC1 = HoleM3
MEC5 = K3-CoM260_KIT_HOLE
Q1001 Q1207 Q1402 Q1501 Q2101 Q2102 Q2501-Q2505 = NMOS
Q1101 Q1201 Q1202 Q1204 Q1205 = PMOS-AONR21357
Q1203 Q1206 = BSS138DW-7-F
Q1301 Q1302 = NMOS-2N7002
Q1401 = PMOS-WPM3401
Q1701 Q2401 = PMOS
Q1702 Q1801 Q1802 = NPN
Q2402 = NST45010MW6T1G
R1001-R1010 R1012-R1015 R1101-R1105 R1201 R1202 R1204-R1210 R1301-R1327 R1401-R1418 R1420-R1424 R1501-R1511 R1515 R1517 R1601 R1603-R1605 R1607 R1610 R1611 R1617-R1619 R1621-R1635 R1701-R1704 R1804 R1805 R1812 R1814-R1818 R1820 R1821 R1901-R1910 R2001 R2004 R2101-R2116 R2201-R2205 R2302 R2304 R2306 R2307 R2309-R2311 R2313 R2317-R2322 R2401-R2404 R2501-R2519 R2522 R2523 = RES
R1011 R1203 R1419 R1819 R2002 R2003 R2524 = 13.6k
R1512-R1514 R1516 R1518 R1519 R1602 R1606 R1608 R1609 R1612-R1615 R1801-R1803 R1806-R1811 R1813 = RES: signal model: CAP_NP_C0402_DISCRETE_0.1UF_0.1uF
R1616 = 470k
R1620 = 22R
R2301 R2303 R2305 R2308 = RES: signal model: RES_R0402_0R_0R
R2312 R2314-R2316 = RES: signal model: CAP_NP_C0402_DISCRETE_0.22UF_0.22uF
TP1101 TP1401-TP1406 TP1901-TP1908 TP2501 = TP
U1001 U1401 U2101 U2301 = 74LVC1G07GW
U1301 U1302 = SY8370
U1303 = ETA3512FSG
U1304 = ETA5053_4
U1402 = EFM8SB10F2G-P3737_0
U1403 U1404 U1901 U1902 = SN74LV1T125
U1501 U1606 U1608 U1609 U1803 U2503 = WS4603E
U1502 = FUSB301TMX
U1503 U1504 U1602-U1605 U1801 U1802 = ESD73034D
U1601 = VL817
U1607 = P25Q40H
U1610 U2401-U2406 = PI4ULS3V504A
U1903 = TS3USB30E
U2501 = GT24C02B-2TFLI-TR
U2502 = MCP2562FD
Y1601 = CRYSTAL-4_2
Y2201 Y2301 Y2302 = 32.768KHz 25ppm

## Footprints (pads in the part's own frame, mm; a bottom-side part is the same pattern mirrored in y, then rotated)
22P_0-5PITCH-SMD
  rect 0.35x1.5 smd: 1(5.25,0) 2(4.75,0) 3(4.25,0) 4(3.75,0) 5(3.25,0) 6(2.75,0) 7(2.25,0) 8(1.75,0) 9(1.25,0) 10(0.75,0) 11(0.25,0) 12(-0.25,0) 13(-0.75,0) 14(-1.25,0) 15(-1.75,0) 16(-2.25,0) 17(-2.75,0) 18(-3.25,0) 19(-3.75,0) 20(-4.25,0) 21(-4.75,0) 22(-5.25,0)
  rect 2x1.7 smd: 23(-6.95,1.6) 24(6.95,1.6)
0402BL
  custom 0.6x0.5 smd: 1(-0.47,0) 2(0.47,0)
C0201
  rect 0.356x0.356 smd: 1(-0.3,0) 2(0.3,0)
C0402
  rect 0.635x0.508 smd: 1(-0.508,0) 2(0.508,0)
C0603
  rect 0.889x0.813 smd: 1(-0.762,0) 2(0.762,0)
C0805
  rect 0.95x1.3 smd: 1(-0.825,0) 2(0.825,0)
C1206
  rect 1.4x1.6 smd: 1(-1.168,0) 2(1.168,0)
CAP_SMD_3216
  rect 1.42x1.35 smd: 1(-1.2,0) 2(1.2,0)
CAP_SMD_7343
  rrect 2.4x3 smd: 1(-3.112,0) 2(3.112,0)
CON_HDR_001X004_TH_RA_M_P025_B
  round 1.6 hole 1.1: 1(-3.81,2.75) 2(-1.27,2.75) 3(1.27,2.75) 4(3.81,2.75)
CON_HDR_001X004_TH_ST_M_P025
  round 1.6 hole 1.1: 1(0,0) 2(2.54,0) 3(5.08,0) 4(7.62,0)
CON_HDR_001X012_TH_RA_M_P025
  round 1.6 hole 1.1: 1(-13.97,2.75) 2(-11.43,2.75) 3(-8.89,2.75) 4(-6.35,2.75) 5(-3.81,2.75) 6(-1.27,2.75) 7(1.27,2.75) 8(3.81,2.75) 9(6.35,2.75) 10(8.89,2.75) 11(11.43,2.75) 12(13.97,2.75)
CON_HDR_002X020_TH_ST_M_P025_B
  round 1.6 hole 1.1: 1(-24.13,-1.27) 2(-24.13,1.27) 3(-21.59,-1.27) 4(-21.59,1.27) 5(-19.05,-1.27) 6(-19.05,1.27) 7(-16.51,-1.27) 8(-16.51,1.27) 9(-13.97,-1.27) 10(-13.97,1.27) 11(-11.43,-1.27) 12(-11.43,1.27) 13(-8.89,-1.27) 14(-8.89,1.27) 15(-6.35,-1.27) 16(-6.35,1.27) 17(-3.81,-1.27) 18(-3.81,1.27) 19(-1.27,-1.27) 20(-1.27,1.27) 21(1.27,-1.27) 22(1.27,1.27) 23(3.81,-1.27) 24(3.81,1.27) 25(6.35,-1.27) 26(6.35,1.27) 27(8.89,-1.27) 28(8.89,1.27) 29(11.43,-1.27) 30(11.43,1.27) 31(13.97,-1.27) 32(13.97,1.27) 33(16.51,-1.27) 34(16.51,1.27) 35(19.05,-1.27) 36(19.05,1.27) 37(21.59,-1.27) 38(21.59,1.27) 39(24.13,-1.27) 40(24.13,1.27)
CON_MINIPEX_075_SMT_RA_M2_KEYM_B
  round 0.13 hole 1.1 unplated: (-10,-1.375)
  round 0.13 hole 1.6 unplated: (10,-1.375)
  rect 0.28x1.3 smd: 1(-9.25,4.125) 2(-9,-3.875) 3(-8.75,4.125) 4(-8.5,-3.875) 5(-8.25,4.125) 6(-8,-3.875) 7(-7.75,4.125) 8(-7.5,-3.875) 9(-7.25,4.125) 10(-7,-3.875) 11(-6.75,4.125) 12(-6.5,-3.875) 13(-6.25,4.125) 14(-6,-3.875) 15(-5.75,4.125) 16(-5.5,-3.875) 17(-5.25,4.125) 18(-5,-3.875) 19(-4.75,4.125) 20(-4.5,-3.875) 21(-4.25,4.125) 22(-4,-3.875) 23(-3.75,4.125) 24(-3.5,-3.875) 25(-3.25,4.125) 26(-3,-3.875) 27(-2.75,4.125) 28(-2.5,-3.875) 29(-2.25,4.125) 30(-2,-3.875) 31(-1.75,4.125) 32(-1.5,-3.875) 33(-1.25,4.125) 34(-1,-3.875) 35(-0.75,4.125) 36(-0.5,-3.875) 37(-0.25,4.125) 38(0,-3.875) 39(0.25,4.125) 40(0.5,-3.875) 41(0.75,4.125) 42(1,-3.875) 43(1.25,4.125) 44(1.5,-3.875) 45(1.75,4.125) 46(2,-3.875) 47(2.25,4.125) 48(2.5,-3.875) 49(2.75,4.125) 50(3,-3.875) 51(3.25,4.125) 52(3.5,-3.875) 53(3.75,4.125) 54(4,-3.875) 55(4.25,4.125) 56(4.5,-3.875) 57(4.75,4.125) 58(5,-3.875) 67(7.25,4.125) 68(7.5,-3.875) 69(7.75,4.125) 70(8,-3.875) 71(8.25,4.125) 72(8.5,-3.875) 73(8.75,4.125) 74(9,-3.875) 75(9.25,4.125)
  rect 1.2x2.75 smd: 76(-10.35,3.125) 77(10.35,3.125)
CON_MISC_002_SMD_RA_M_P013_WTB_B
  rect 0.8x1.6 smd: 1(0.625,-3.1) 2(-0.625,-3.1)
  rect 2.1x3 smd: 3(3.175,0.1) 4(-3.175,0.1)
CON_MISC_004_TH_ST_M_P013_WTB
  round 1.04 hole 0.64: 1(0,0) 2(-1.25,0) 3(-2.5,0) 4(-3.75,0)
CON_SODIMM_260_SMT_RA_F_P005
  round 0.13 hole 1.1 unplated: (-34.4,0.1)
  round 0.13 hole 1.6 unplated: (34.4,0.1)
  rect 0.28x1.75 smd: 1(33.375,4.2) 2(33.125,-4) 3(32.875,4.2) 4(32.625,-4) 5(32.375,4.2) 6(32.125,-4) 7(31.875,4.2) 8(31.625,-4) 9(31.375,4.2) 10(31.125,-4) 11(30.875,4.2) 12(30.625,-4) 13(30.375,4.2) 14(30.125,-4) 15(29.875,4.2) 16(29.625,-4) 17(29.375,4.2) 18(29.125,-4) 19(28.875,4.2) 20(28.625,-4) 21(28.375,4.2) 22(28.125,-4) 23(27.875,4.2) 24(27.625,-4) 25(27.375,4.2) 26(27.125,-4) 27(26.875,4.2) 28(26.625,-4) 29(26.375,4.2) 30(26.125,-4) 31(25.875,4.2) 32(25.625,-4) 33(25.375,4.2) 34(25.125,-4) 35(24.875,4.2) 36(24.625,-4) 37(24.375,4.2) 38(24.125,-4) 39(23.875,4.2) 40(23.625,-4) 41(23.375,4.2) 42(23.125,-4) 43(22.875,4.2) 44(22.625,-4) 45(22.375,4.2) 46(22.125,-4) 47(21.875,4.2) 48(21.625,-4) 49(21.375,4.2) 50(21.125,-4) 51(20.875,4.2) 52(20.625,-4) 53(20.375,4.2) 54(20.125,-4) 55(19.875,4.2) 56(19.625,-4) 57(19.375,4.2) 58(19.125,-4) 59(18.875,4.2) 60(18.625,-4) 61(18.375,4.2) 62(18.125,-4) 63(17.875,4.2) 64(17.625,-4) 65(17.375,4.2) 66(17.125,-4) 67(16.875,4.2) 68(16.625,-4) 69(16.375,4.2) 70(16.125,-4) 71(15.875,4.2) 72(15.625,-4) 73(15.375,4.2) 74(15.125,-4) 75(14.875,4.2) 76(14.625,-4) 77(14.375,4.2) 78(14.125,-4) 79(13.875,4.2) 80(13.625,-4) 81(13.375,4.2) 82(13.125,-4) 83(12.875,4.2) 84(12.625,-4) 85(12.375,4.2) 86(12.125,-4) 87(11.875,4.2) 88(11.625,-4) 89(11.375,4.2) 90(11.125,-4) 91(10.875,4.2) 92(10.625,-4) 93(10.375,4.2) 94(10.125,-4) 95(9.875,4.2) 96(9.625,-4) 97(9.375,4.2) 98(9.125,-4) 99(8.875,4.2) 100(8.625,-4) 101(8.375,4.2) 102(8.125,-4) 103(7.875,4.2) 104(7.625,-4) 105(7.375,4.2) 106(7.125,-4) 107(6.875,4.2) 108(6.625,-4) 109(6.375,4.2) 110(6.125,-4) 111(5.875,4.2) 112(5.625,-4) 113(5.375,4.2) 114(5.125,-4) 115(4.875,4.2) 116(4.625,-4) 117(4.375,4.2) 118(4.125,-4) 119(3.875,4.2) 120(3.625,-4) 121(3.375,4.2) 122(3.125,-4) 123(2.875,4.2) 124(2.625,-4) 125(2.375,4.2) 126(2.125,-4) 127(1.875,4.2) 128(1.625,-4) 129(1.375,4.2) 130(1.125,-4) 131(0.875,4.2) 132(0.625,-4) 133(0.375,4.2) 134(0.125,-4) 135(-0.125,4.2) 136(-0.375,-4) 137(-0.625,4.2) 138(-0.875,-4) 139(-1.125,4.2) 140(-1.375,-4) 141(-1.625,4.2) 142(-1.875,-4) 143(-2.125,4.2) 144(-2.375,-4) 145(-4.625,4.2) 146(-4.875,-4) 147(-5.125,4.2) 148(-5.375,-4) 149(-5.625,4.2) 150(-5.875,-4) 151(-6.125,4.2) 152(-6.375,-4) 153(-6.625,4.2) 154(-6.875,-4) 155(-7.125,4.2) 156(-7.375,-4) 157(-7.625,4.2) 158(-7.875,-4) 159(-8.125,4.2) 160(-8.375,-4) 161(-8.625,4.2) 162(-8.875,-4) 163(-9.125,4.2) 164(-9.375,-4) 165(-9.625,4.2) 166(-9.875,-4) 167(-10.125,4.2) 168(-10.375,-4) 169(-10.625,4.2) 170(-10.875,-4) 171(-11.125,4.2) 172(-11.375,-4) 173(-11.625,4.2) 174(-11.875,-4) 175(-12.125,4.2) 176(-12.375,-4) 177(-12.625,4.2) 178(-12.875,-4) 179(-13.125,4.2) 180(-13.375,-4) 181(-13.625,4.2) 182(-13.875,-4) 183(-14.125,4.2) 184(-14.375,-4) 185(-14.625,4.2) 186(-14.875,-4) 187(-15.125,4.2) 188(-15.375,-4) 189(-15.625,4.2) 190(-15.875,-4) 191(-16.125,4.2) 192(-16.375,-4) 193(-16.625,4.2) 194(-16.875,-4) 195(-17.125,4.2) 196(-17.375,-4) 197(-17.625,4.2) 198(-17.875,-4) 199(-18.125,4.2) 200(-18.375,-4) 201(-18.625,4.2) 202(-18.875,-4) 203(-19.125,4.2) 204(-19.375,-4) 205(-19.625,4.2) 206(-19.875,-4) 207(-20.125,4.2) 208(-20.375,-4) 209(-20.625,4.2) 210(-20.875,-4) 211(-21.125,4.2) 212(-21.375,-4) 213(-21.625,4.2) 214(-21.875,-4) 215(-22.125,4.2) 216(-22.375,-4) 217(-22.625,4.2) 218(-22.875,-4) 219(-23.125,4.2) 220(-23.375,-4) 221(-23.625,4.2) 222(-23.875,-4) 223(-24.125,4.2) 224(-24.375,-4) 225(-24.625,4.2) 226(-24.875,-4) 227(-25.125,4.2) 228(-25.375,-4) 229(-25.625,4.2) 230(-25.875,-4) 231(-26.125,4.2) 232(-26.375,-4) 233(-26.625,4.2) 234(-26.875,-4) 235(-27.125,4.2) 236(-27.375,-4) 237(-27.625,4.2) 238(-27.875,-4) 239(-28.125,4.2) 240(-28.375,-4) 241(-28.625,4.2) 242(-28.875,-4) 243(-29.125,4.2) 244(-29.375,-4) 245(-29.625,4.2) 246(-29.875,-4) 247(-30.125,4.2) 248(-30.375,-4) 249(-30.625,4.2) 250(-30.875,-4) 251(-31.125,4.2) 252(-31.375,-4) 253(-31.625,4.2) 254(-31.875,-4) 255(-32.125,4.2) 256(-32.375,-4) 257(-32.625,4.2) 258(-32.875,-4) 259(-33.125,4.2) 260(-33.375,-4)
  rect 2x3.5 smd: 261(-37.75,-7.9) 262(37.75,-11.9)
CON_USB_024_SMT_RA_F_100X096_C
  round 0.13 hole 0.65 unplated: (-3.6,4.365)
  round 0.13 hole 0.95x0.65 unplated: (3.6,4.365)
  custom 1.1x1.7 hole 0.5x1.1: 25(-4.13,3.115)
  custom 1.1x1.699 hole 0.5x1.1: 26(4.13,3.115)
  oval 1.1x1.7 hole 0.5x1.1: 27(-4.49,-0.335) 28(4.49,-0.335)
  rect 0.28x0.9 smd: A1(-2.75,5.125) A2(-2.25,5.125) A3(-1.75,5.125) A4(-1.25,5.125) A5(-0.75,5.125) A6(-0.25,5.125) A7(0.25,5.125) A8(0.75,5.125) A9(1.25,5.125) A10(1.75,5.125) A11(2.25,5.125) A12(2.75,5.125) B1(2.5,3.425) B2(2,3.425) B3(1.5,3.425) B4(1,3.425) B5(0.5,3.425) B6(0,3.425) B7(-0.5,3.425) B8(-1,3.425) B9(-1.5,3.425) B10(-2,3.425) B11(-2.5,3.425) B12(-3,3.425)
DFET_003_SMD_010X006_B
  rect 0.4x0.25 smd: 1(0.35,-0.227) 2(0.35,0.227)
  rect 0.4x0.7 smd: 3(-0.35,0)
DFN4-0_65-1_05X1_05HS0_47-H0_4
  custom 0.26x0.35 smd: 1(-0.325,-0.435) 3(0.325,0.435)
  custom 0.26x0.39 smd: 2(0.325,-0.435) 4(-0.325,0.435)
  rect 0.483x0.483 smd rot 45: 5(0,0)
DFN8-0_65-3_0X3_0H2_4X1_6-H1_0
  oval 0.356x0.66 smd: 1(-0.975,-1.53) 2(-0.325,-1.53) 3(0.325,-1.53) 4(0.975,-1.53) 5(0.975,1.53) 6(0.325,1.53) 7(-0.325,1.53) 8(-0.975,1.53)
  rect 2.413x1.6 smd: 9(0,0)
DFN8-P0_65-3X3-H0_9
  rect 0.35x0.5 smd: 1(-0.975,-1.399) 2(-0.325,-1.399) 3(0.325,-1.399) 4(0.975,-1.399) 5(0.975,1.399) 6(0.325,1.399) 7(-0.325,1.399) 8(-0.975,1.399)
  rect 3.21x1.78 smd: 9(0,0.13)
DFN10-2_55X1_05-H0_55
  rect 0.2x0.68 smd: 1(-1,-0.437) 2(-0.5,-0.437) 4(0.5,-0.437) 5(1,-0.437) 6(1,0.437) 7(0.5,0.437) 9(-0.5,0.437) 10(-1,0.437)
  rect 0.4x0.75 smd: 3(0,-0.395) 8(0,0.395)
DIODE_SMD_SOD323_C
  rect 0.75x0.5 smd: 1(-1.125,0) 2(1.125,0)
DIODE_SMD_SOD523_B
  rect 0.69x0.41 smd: 1(-0.717,0) 2(0.717,0)
DO219AD-2_3X1_4-H0_73
  rect 2.032x1.118 smd: 1(-0.65,0)
  rect 0.813x0.813 smd: 2(1.25,0)
DP20-P0_5-S17_8X14_4-H7
  round 1.397 hole 1.397 unplated: (0,-3.138)
  rect 0.3x2.4 smd: 1(5.5,7.142) 2(5,7.142) 3(4.5,7.142) 4(4,7.142) 5(3.5,7.142) 6(3,7.142) 7(2.5,7.142) 8(2,7.142) 9(1.5,7.142) 10(1,7.142) 11(0.5,7.142) 12(0,7.142) 13(-0.5,7.142) 14(-1,7.142) 15(-1.5,7.142) 16(-2,7.142) 17(-2.5,7.142) 18(-3,7.142) 19(-3.5,7.142) 20(-4,7.142)
  oval 1.3x2.4 hole 0.7x1.8: 21(-8.25,4.542) 22(-8.25,-2.238) 23(8.25,-2.238) 24(8.25,4.542)
ESD0402
  rect 0.4x0.6 smd: 1(-0.325,0) 2(0.325,0)
FILTER_004_SMD_006X005
  rect 0.3x0.23 smd: 1(-0.275,0.217) 2(0.275,0.217) 3(0.275,-0.217) 4(-0.275,-0.217)
FPC30-1_0-22_1X2_5-H5_4
  rect 0.508x1.499 smd: 1(-7,-1.65) 2(-7,1.65) 3(-6,-1.65) 4(-6,1.65) 5(-5,-1.65) 6(-5,1.65) 7(-4,-1.65) 8(-4,1.65) 9(-3,-1.65) 10(-3,1.65) 11(-2,-1.65) 12(-2,1.65) 13(-1,-1.65) 14(-1,1.65) 15(0,-1.65) 16(0,1.65) 17(1,-1.65) 18(1,1.65) 19(2,-1.65) 20(2,1.65) 21(3,-1.65) 22(3,1.65) 23(4,-1.65) 24(4,1.65) 25(5,-1.65) 26(5,1.65) 27(6,-1.65) 28(6,1.65) 29(7,-1.65) 30(7,1.65)
HEADER2-1_0-P2_54
  rect 1.5x1.5 hole 1: 1(-1.27,0)
  round 1.5 hole 1: 2(1.27,0)
HOLE3_8X5_5-PTH-TP
  round 5.5 hole 3.8: 1(0,0)
IND2520
  rect 0.8x1.999 smd: 1(-1.001,0) 2(1.001,0)
IND_2016A
  rect 0.864x1.803 smd: 1(-0.835,0) 2(0.835,0)
JACK_DC-005-5A-2P5_XKB
  oval 1.8x4.2 hole 1x3.5: 1(3,2.352)
  oval 1.8x4 hole 1x3.3: 2(-3,2.352)
  oval 4x1.8 hole 3.3x1: 3(0,-2.352)
L2-7_3X6_8-H2_4
  rect 2.362x3.505 smd: 1(-3.025,0) 2(3.025,0)
L2-7_3X6_8-H3_0
  rect 2.362x3.505 smd: 1(-3.025,0) 2(3.025,0)
M2_KEYE-75P-22_15X9_35-H2_75
  round 1.1 hole 1.1 unplated: (-10,0)
  round 5.5 hole 3.8: (0,-28.25)
  round 1.6 hole 1.6 unplated: (10,0)
  rect 0.3x1.55 smd: 1(-9.25,5.275) 2(-9,-2.275) 3(-8.75,5.275) 4(-8.5,-2.275) 5(-8.25,5.275) 6(-8,-2.275) 7(-7.75,5.275) 8(-7.5,-2.275) 9(-7.25,5.275) 10(-7,-2.275) 11(-6.75,5.275) 12(-6.5,-2.275) 13(-6.25,5.275) 14(-6,-2.275) 15(-5.75,5.275) 16(-5.5,-2.275) 17(-5.25,5.275) 18(-5,-2.275) 19(-4.75,5.275) 20(-4.5,-2.275) 21(-4.25,5.275) 22(-4,-2.275) 23(-3.75,5.275) 32(-1.5,-2.275) 33(-1.25,5.275) 34(-1,-2.275) 35(-0.75,5.275) 36(-0.5,-2.275) 37(-0.25,5.275) 38(0,-2.275) 39(0.25,5.275) 40(0.5,-2.275) 41(0.75,5.275) 42(1,-2.275) 43(1.25,5.275) 44(1.5,-2.275) 45(1.75,5.275) 46(2,-2.275) 47(2.25,5.275) 48(2.5,-2.275) 49(2.75,5.275) 50(3,-2.275) 51(3.25,5.275) 52(3.5,-2.275) 53(3.75,5.275) 54(4,-2.275) 55(4.25,5.275) 56(4.5,-2.275) 57(4.75,5.275) 58(5,-2.275) 59(5.25,5.275) 60(5.5,-2.275) 61(5.75,5.275) 62(6,-2.275) 63(6.25,5.275) 64(6.5,-2.275) 65(6.75,5.275) 66(7,-2.275) 67(7.25,5.275) 68(7.5,-2.275) 69(7.75,5.275) 70(8,-2.275) 71(8.25,5.275) 72(8.5,-2.275) 73(8.75,5.275) 74(9,-2.275) 75(9.25,5.275)
  rect 1.2x2.75 smd: 76(-10.35,4.5) 77(10.35,4.5)
M2_KEYM-77-P0_5-22X9_1-H2_75
  round 1.1 hole 1.1 unplated: (-10,0)
  round 5.5 hole 3.8: (0,-78.25)
  round 1.6 hole 1.6 unplated: (10,0)
  rect 0.3x1.55 smd: 1(-9.25,5.275) 2(-9,-2.275) 3(-8.75,5.275) 4(-8.5,-2.275) 5(-8.25,5.275) 6(-8,-2.275) 7(-7.75,5.275) 8(-7.5,-2.275) 9(-7.25,5.275) 10(-7,-2.275) 11(-6.75,5.275) 12(-6.5,-2.275) 13(-6.25,5.275) 14(-6,-2.275) 15(-5.75,5.275) 16(-5.5,-2.275) 17(-5.25,5.275) 18(-5,-2.275) 19(-4.75,5.275) 20(-4.5,-2.275) 21(-4.25,5.275) 22(-4,-2.275) 23(-3.75,5.275) 24(-3.5,-2.275) 25(-3.25,5.275) 26(-3,-2.275) 27(-2.75,5.275) 28(-2.5,-2.275) 29(-2.25,5.275) 30(-2,-2.275) 31(-1.75,5.275) 32(-1.5,-2.275) 33(-1.25,5.275) 34(-1,-2.275) 35(-0.75,5.275) 36(-0.5,-2.275) 37(-0.25,5.275) 38(0,-2.275) 39(0.25,5.275) 40(0.5,-2.275) 41(0.75,5.275) 42(1,-2.275) 43(1.25,5.275) 44(1.5,-2.275) 45(1.75,5.275) 46(2,-2.275) 47(2.25,5.275) 48(2.5,-2.275) 49(2.75,5.275) 50(3,-2.275) 51(3.25,5.275) 52(3.5,-2.275) 53(3.75,5.275) 54(4,-2.275) 55(4.25,5.275) 56(4.5,-2.275) 57(4.75,5.275) 58(5,-2.275) 67(7.25,5.275) 68(7.5,-2.275) 69(7.75,5.275) 70(8,-2.275) 71(8.25,5.275) 72(8.5,-2.275) 73(8.75,5.275) 74(9,-2.275) 75(9.25,5.275)
  rect 1.2x2.75 smd: 76(-10.35,4.5) 77(10.35,4.5)
